# Altium PCB PCB_GTV3.5.PcbDoc (part 1 of 11)
Units mil, origin at the board's own origin, x right, y up, seen from the top; angles counter-clockwise.
Board outline 8070.87 x 4881.89 mil, 4 copper layers (Top Layer, GND, PWR, Bottom Layer), stack 61.653 mil thick; 490 components, 296 nets, 1533 pads, 845 vias.
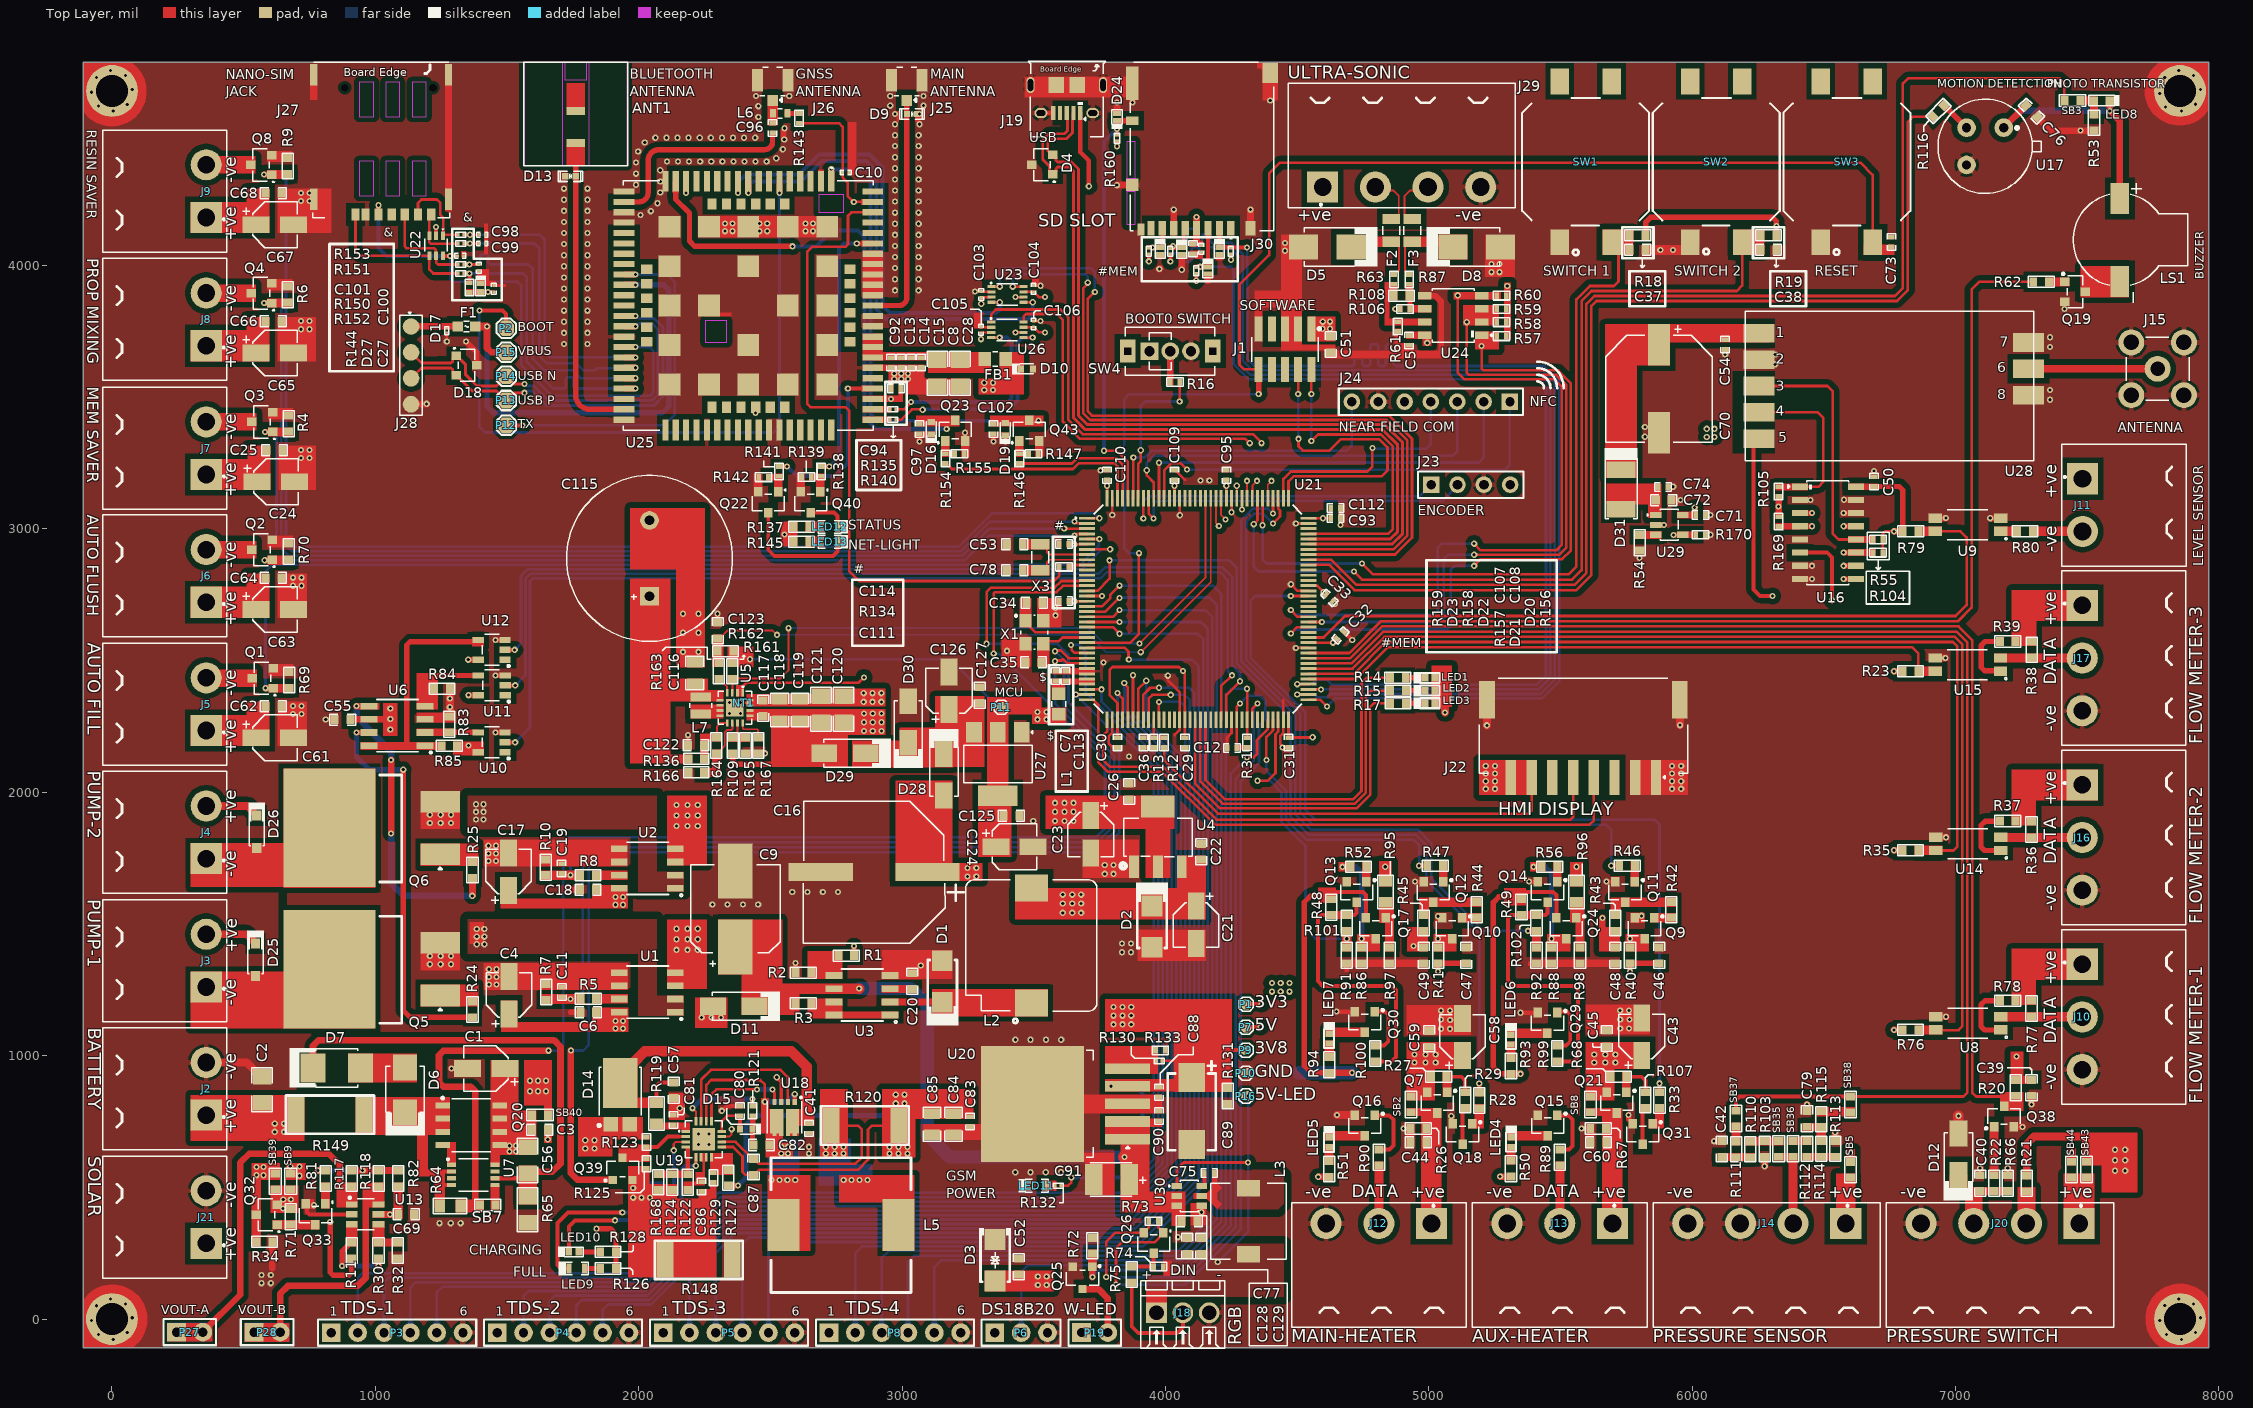
[diagram p0: Top Layer view]
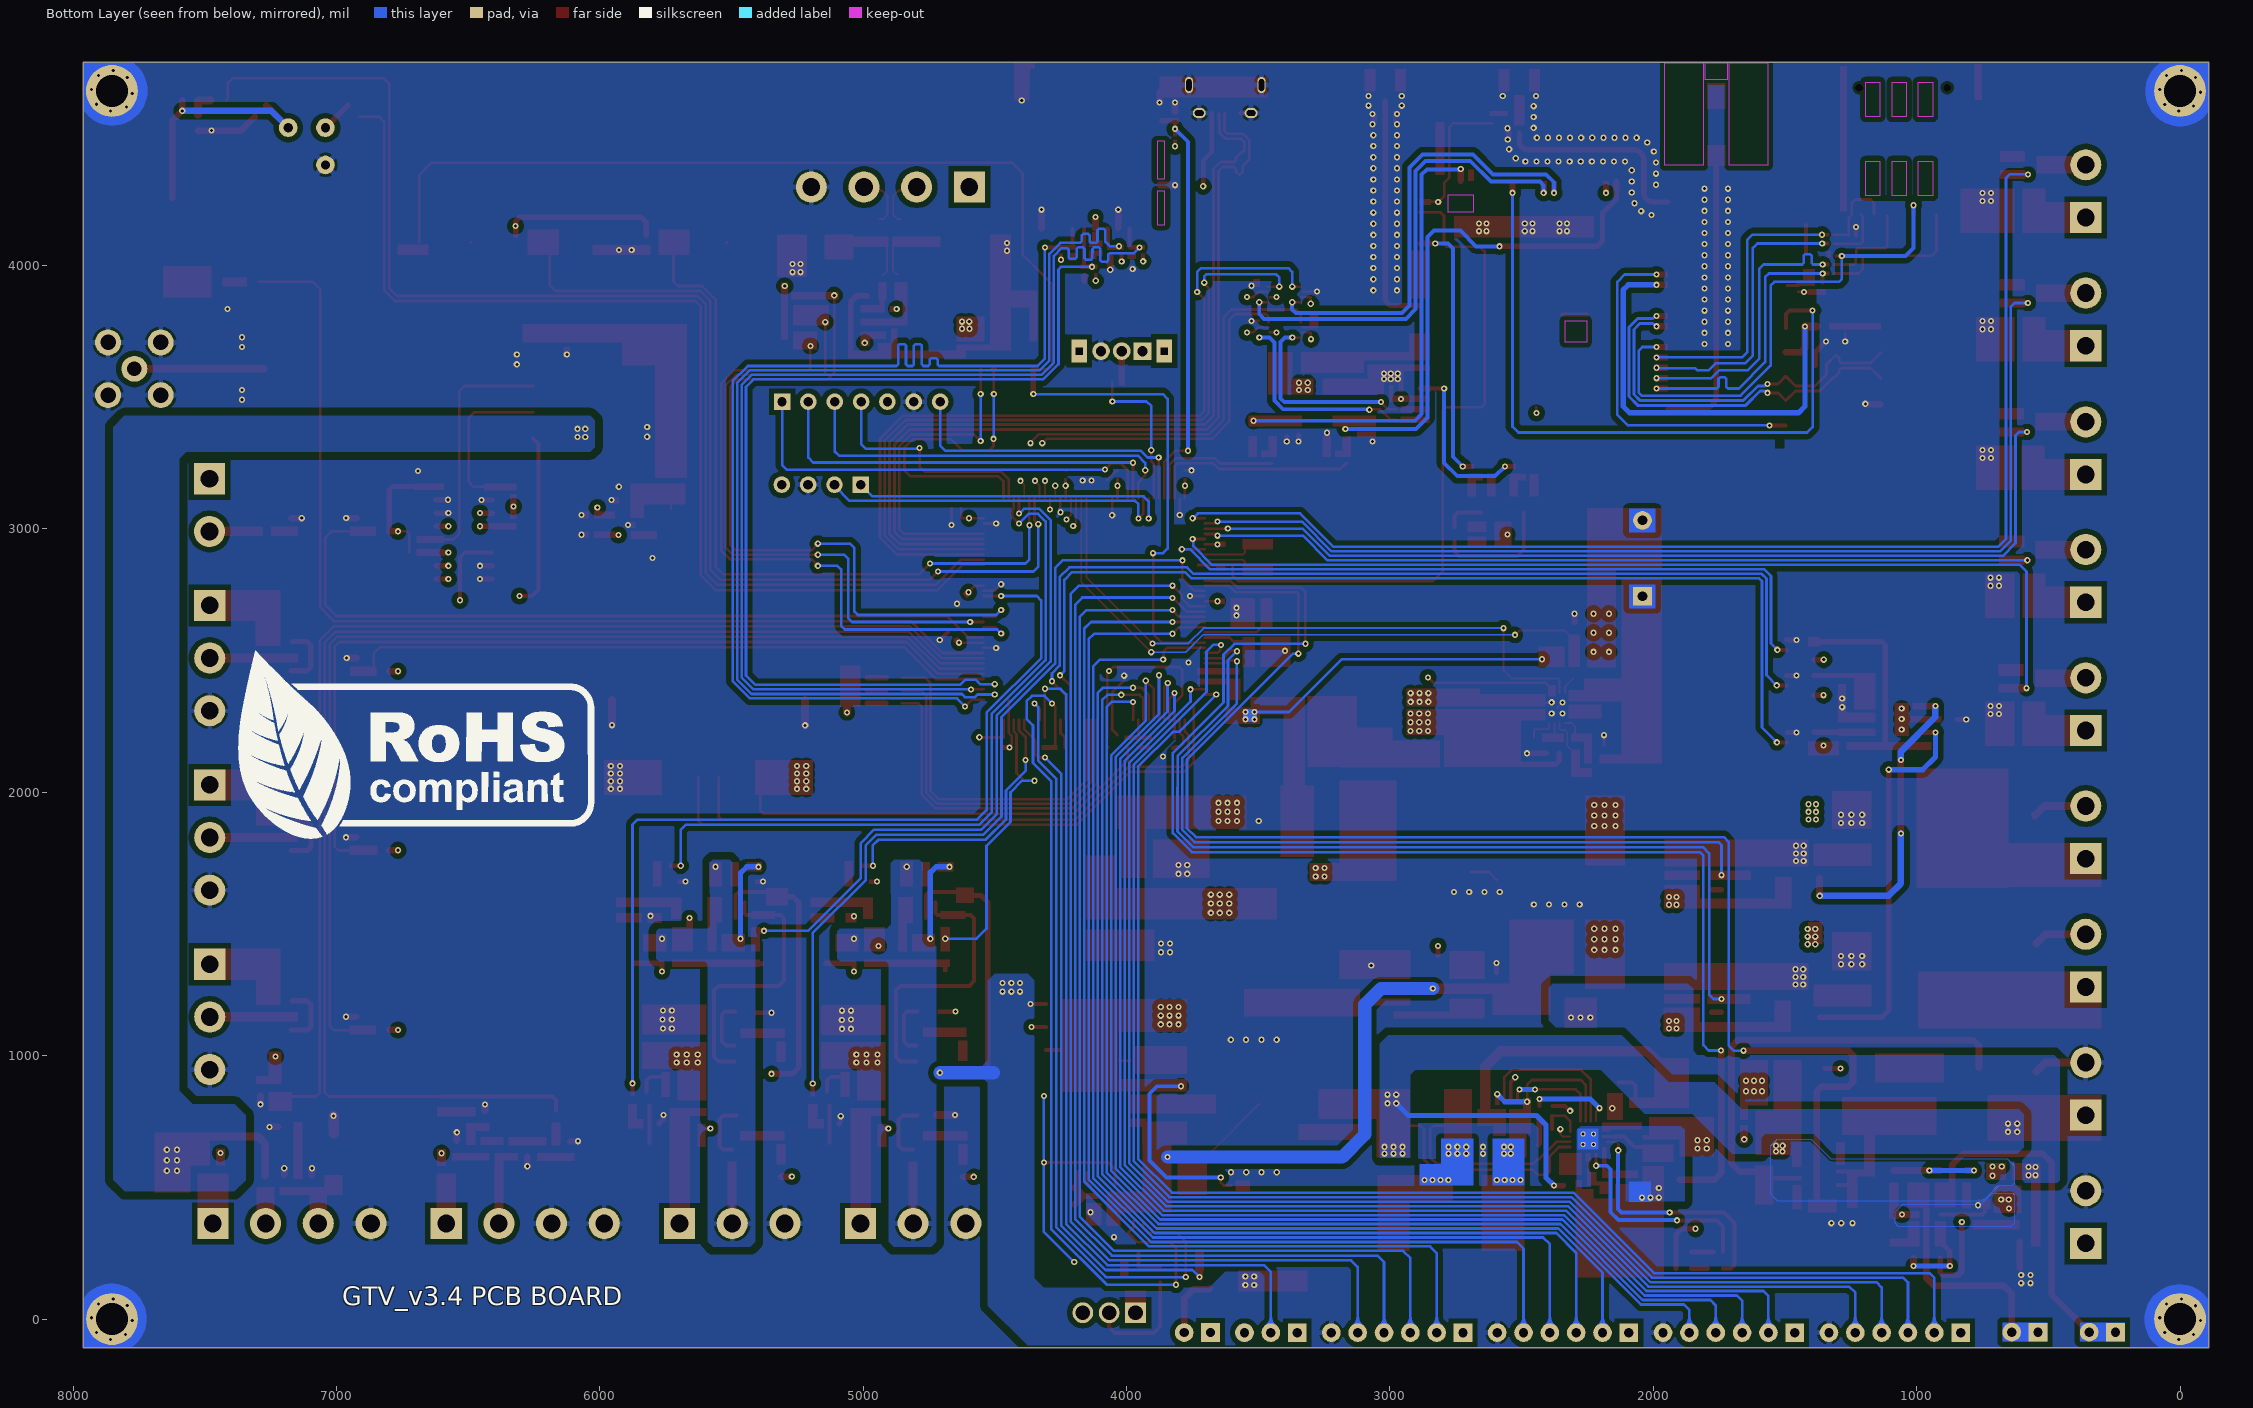
[diagram p1: Bottom Layer view, seen from below]
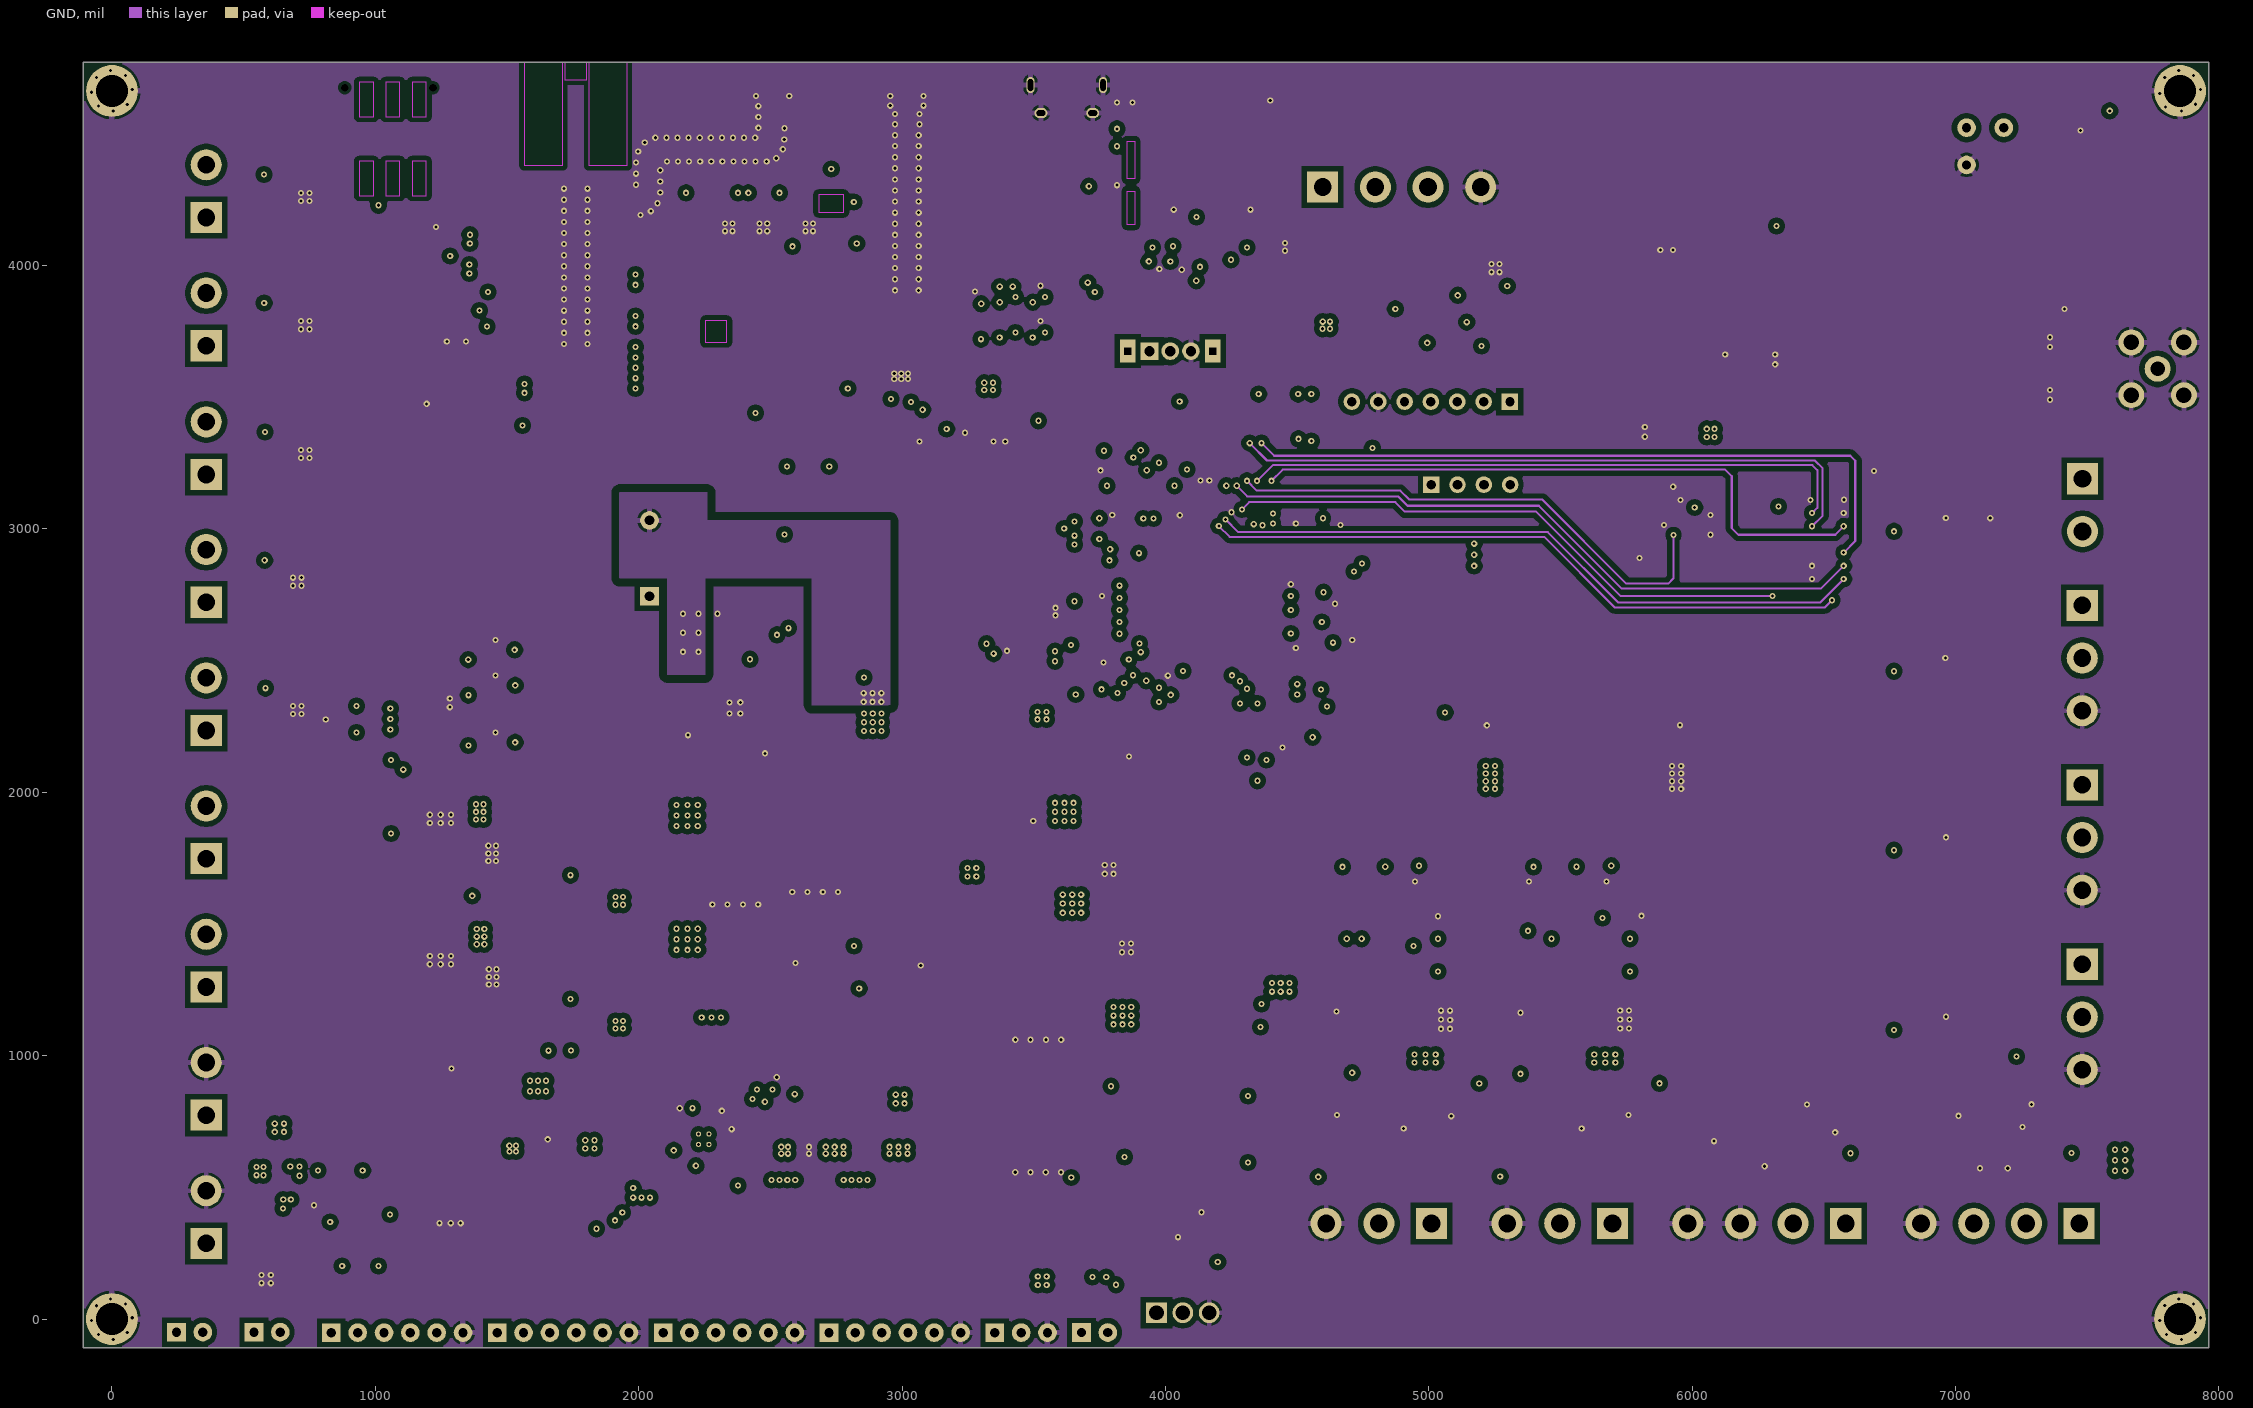
[diagram p2: GND]
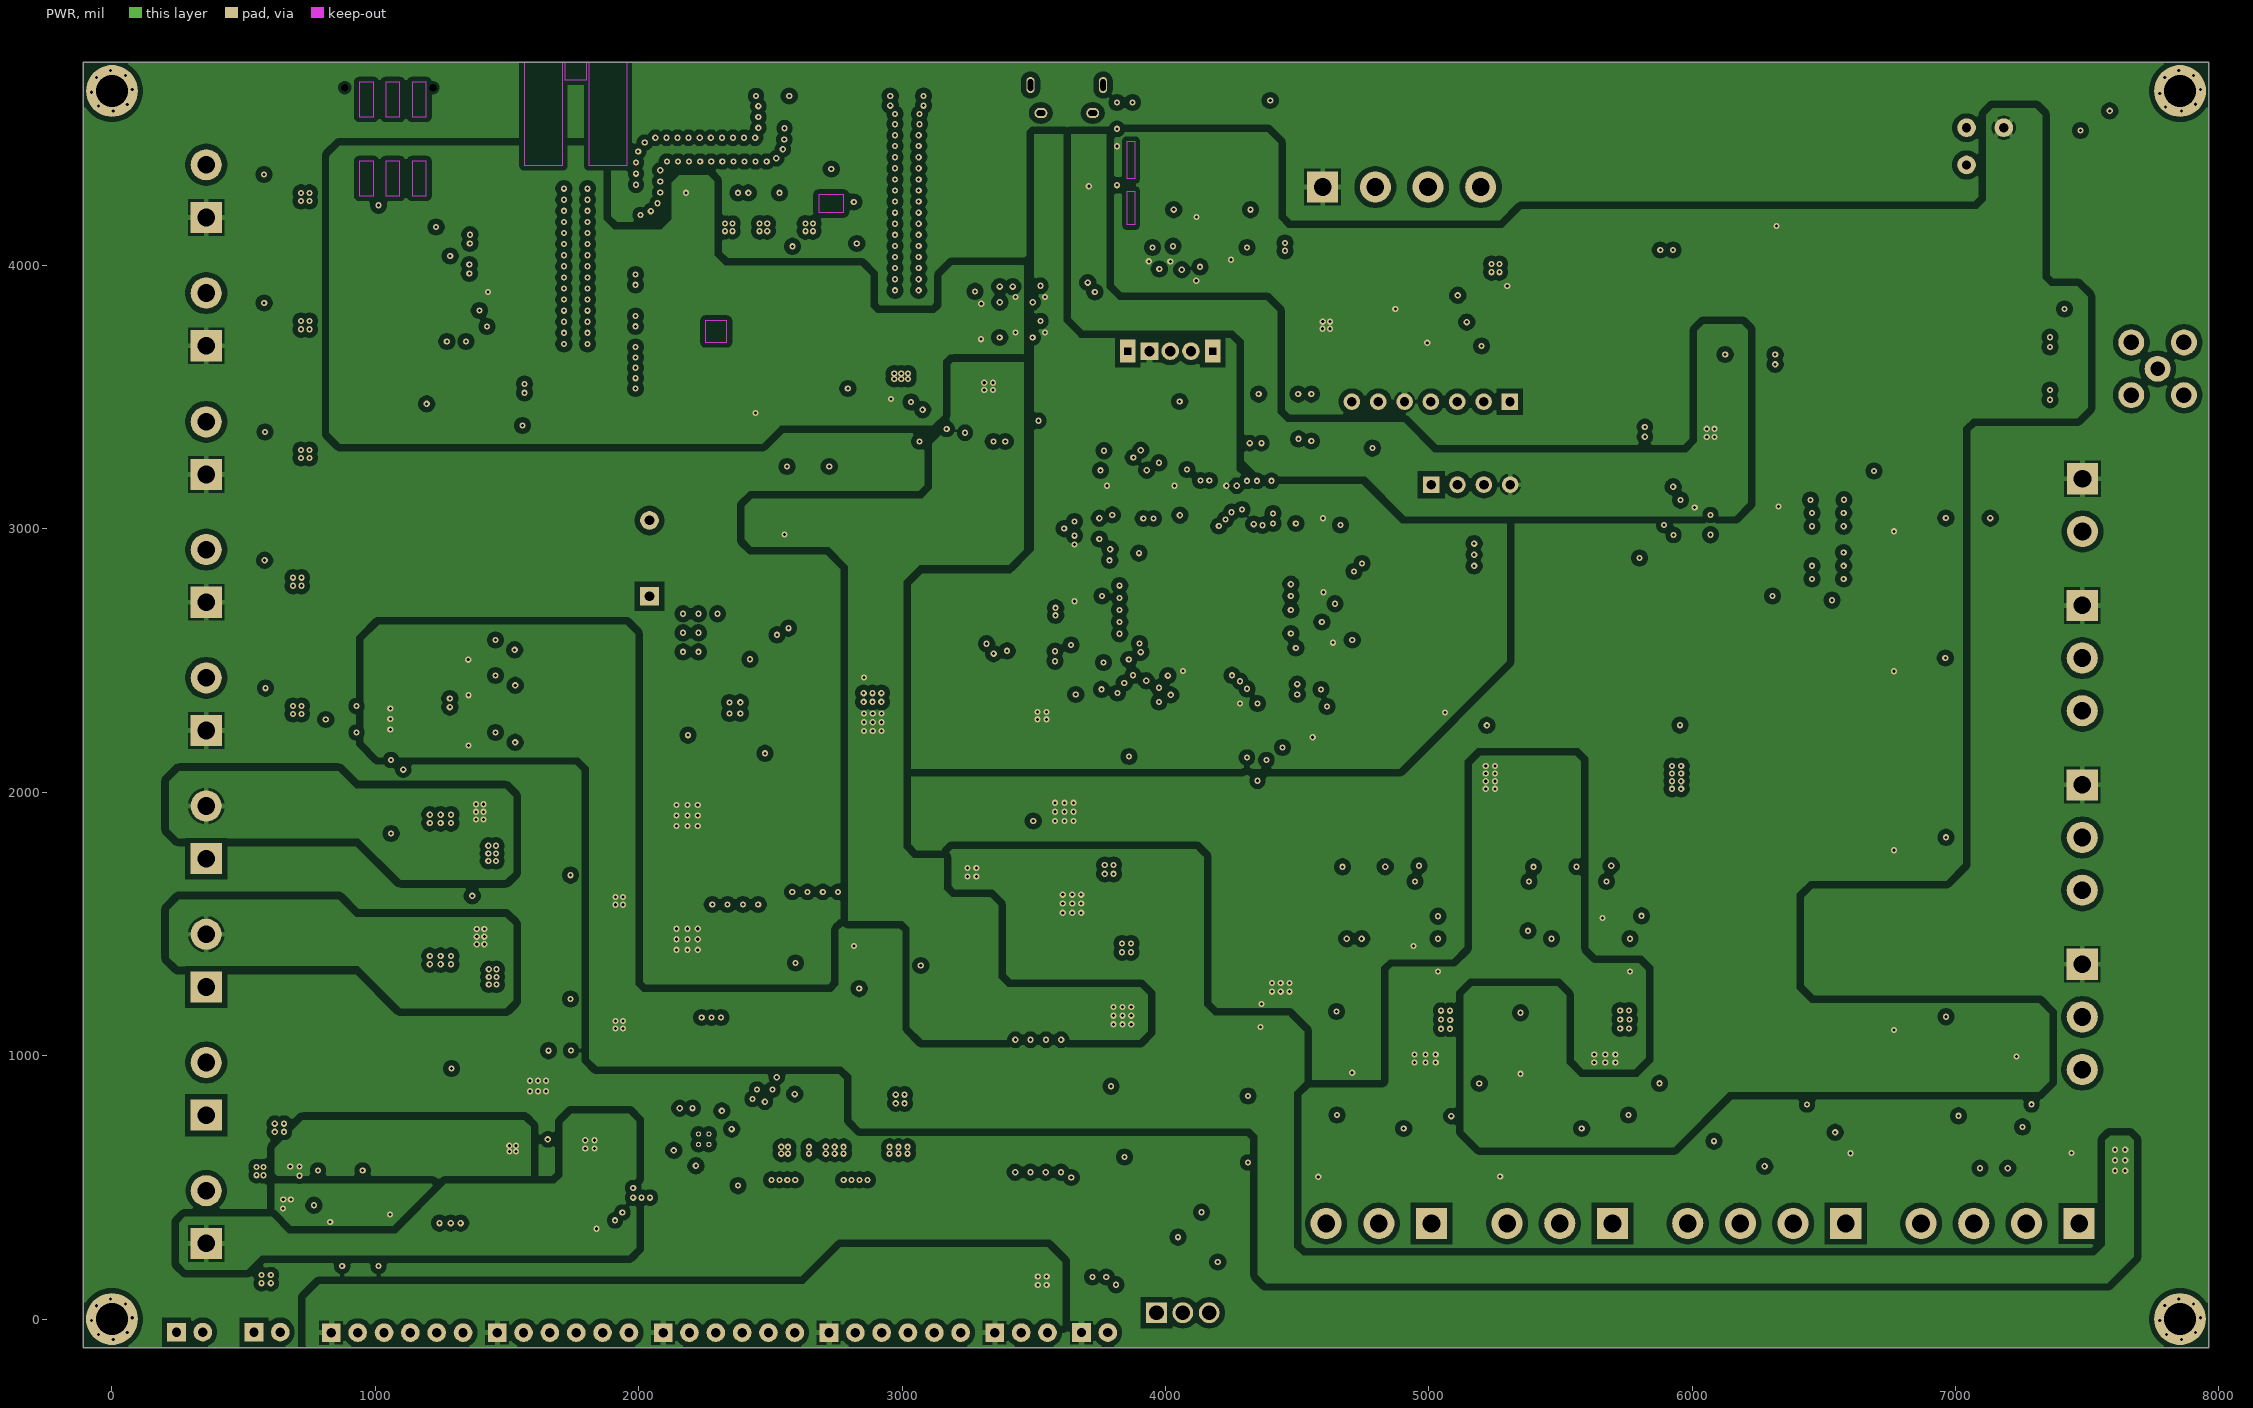
[diagram p3: PWR]
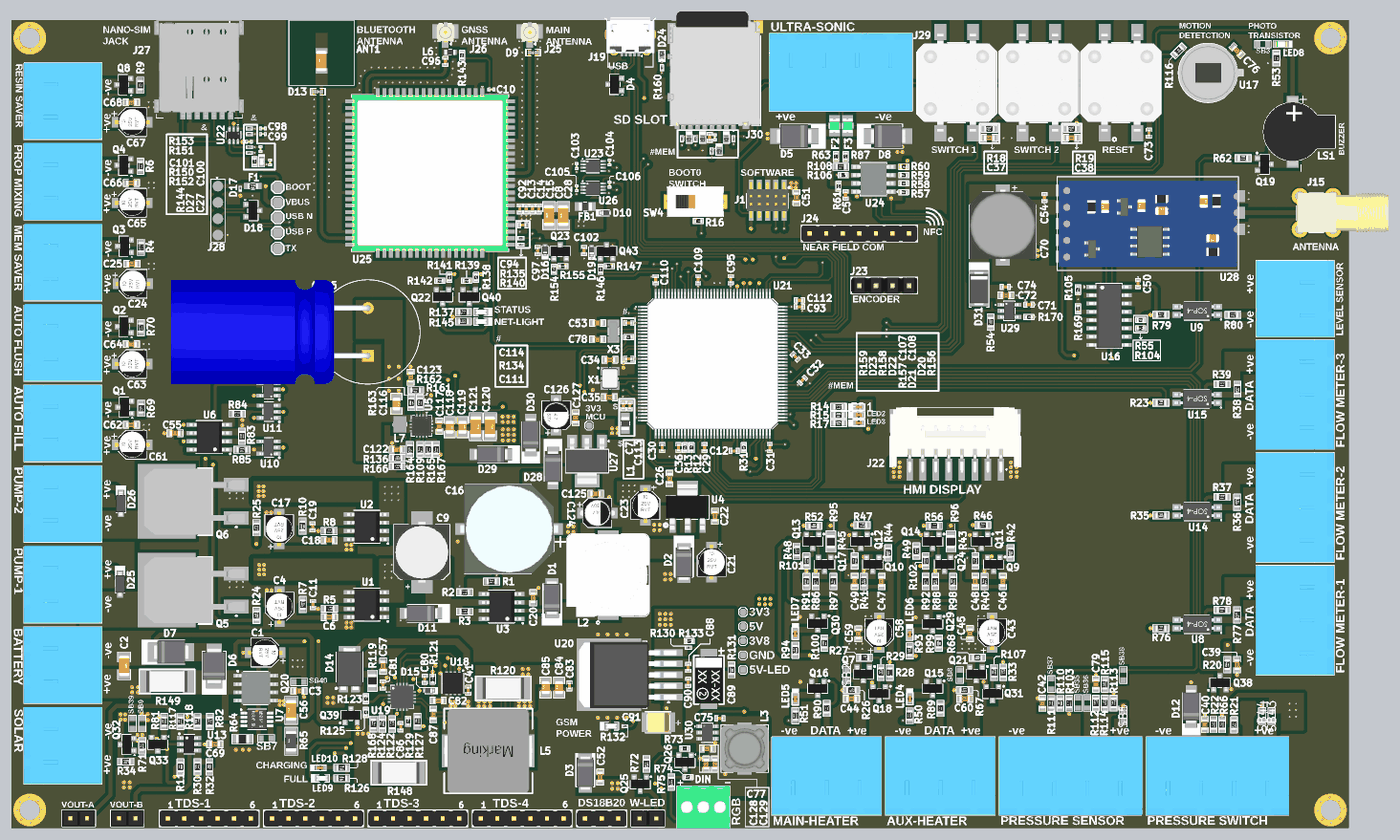
[diagram p9: 3D render of the assembled board from above, using the file's embedded part models]

## Layer stack, top to bottom
Top Solder: solder mask 0.709, Solder Resist, Dk 3.5
Top Layer: signal copper 1.378
Dielectric 2: prepreg 7.992, PP-006, Dk 4.4
GND: signal copper 1.181
Dielectric 1: core 40.551, FR-4, Dk 4.6
PWR: signal copper 1.181
Dielectric 3: prepreg 7.992, PP-006, Dk 4.4
Bottom Layer: signal copper 1.378
Bottom Solder: solder mask 0.709, Solder Resist, Dk 3.5

## Board outline
-109.33,-109.43 7961.54,-109.43 7961.54,4772.46 -109.33,4772.46

## Design rules (kind name [scope] priority, off if disabled: settings)
Clearance [All] p1: gap=10 ignorepadtopadclearanceinfootprint=FALSE except(7: Arc-SMDPad Track-Track Track-SMDPad SMDPad-SMDPad SMDPad-Via SMDPad-Fill; 20: Arc-Poly Track-Poly SMDPad-Poly THPad-Poly Via-Poly Fill-Poly Poly-Region; 30: Poly-Poly)
ComponentClearance [All] p1: gap=0 collisioncheckmode=3 verticalgap=0 showdistances=FALSE
DiffPairsRouting RS485 [InDifferentialPairClass('RS485_LINES')] p1: maxlimit=15 minlimit=15 mostfreqgap=15 toplayer_minwidth=7 toplayer_maxwidth=7 toplayer_prefwidth=7 bottomlayer_minwidth=7 bottomlayer_maxwidth=7 bottomlayer_prefwidth=7 impedanceprofiledriven=TRUE impedanceprofileid={96F7C619-5FC5-426D-8E7C-580E3D6EA915} impedanceprofilevalue=120.000000 maxuncoupledlength=500
DiffPairsRouting USB [All] p2: maxlimit=8 minlimit=8 mostfreqgap=8 toplayer_minwidth=11 toplayer_maxwidth=11 toplayer_prefwidth=11 bottomlayer_minwidth=11 bottomlayer_maxwidth=11 bottomlayer_prefwidth=11 impedanceprofiledriven=TRUE impedanceprofileid={F2DA4722-311A-4C31-A35F-DFB7A417A014} impedanceprofilevalue=90.000000 maxuncoupledlength=500
HoleSize [All] p1: absolutevalues=TRUE maxlimit=1000 minlimit=1 maxpercent=80.000 minpercent=20.000
HoleToHoleClearance [All] p1: gap=0 allowstackedmicrovias=TRUE
MatchedLengths "Schematic Matched Net Lengths_1" [InNetClass('GSM_USB')] p1: tolerance=20 checknetsindiffpair=TRUE checkdiffpairvsdiffpair=FALSE checkxsignals=FALSE checkothers=FALSE
MatchedLengths "Schematic Matched Net Lengths" [InNetClass('RS485')] p2: tolerance=20 checknetsindiffpair=TRUE checkdiffpairvsdiffpair=FALSE checkxsignals=FALSE checkothers=FALSE
MatchedLengths "Schematic Matched Net Lengths_2" [InNetClass('USB_D')] p3: tolerance=50 checknetsindiffpair=TRUE checkdiffpairvsdiffpair=FALSE checkxsignals=FALSE checkothers=FALSE
MaxMinImpedance "Schematic Impedance Constraint_1" [InNetClass('GSM_USB')] p1: minimum=88.00 maximum=90.00
MaxMinImpedance "Schematic Impedance Constraint" [InNetClass('RS485')] p2: minimum=115.0 maximum=120.0
MaxMinImpedance "Schematic Impedance Constraint_2" [InNetClass('USB_D')] p3: minimum=85.00 maximum=90.00
MinimumSolderMaskSliver [All] p1: minsoldermaskwidth=0
PlaneClearance PlaneClearance_1 [All] p1: clearance=5
PlaneConnect [All] p1: pad.planeconnectstyle=Relief pad.reliefexpansion=20 pad.reliefentries=4 pad.reliefconductorwidth=20 pad.reliefairgap=10 via.planeconnectstyle=Direct via.reliefexpansion=20 via.reliefentries=4 via.reliefconductorwidth=10 via.reliefairgap=10
PolygonConnect [All] p1: thpad.connectstyle=Relief thpad.reliefconductorwidth=20 thpad.reliefentries=4 thpad.polygonreliefangle="90 Angle" thpad.airgapwidth=10 smdpad.connectstyle=Direct smdpad.reliefconductorwidth=20 smdpad.reliefentries=4 smdpad.polygonreliefangle="90 Angle" smdpad.airgapwidth=10 via.connectstyle=Direct via.reliefconductorwidth=10 via.reliefentries=4 via.polygonreliefangle="90 Angle" via.airgapwidth=10
RoutingVias [All] p1: holewidth=11.81 width=23.62 viastyle="Through Hole" minholewidth=11.81 minwidth=23.62 maxholewidth=31.5 maxwidth=62.99
SilkToSilkClearance [All] p1: silktosilkclearance=0
SilkToSolderMaskClearance [IsPad] p1: minsilkscreentomaskgap=0 clearancetoexposedcopper=TRUE
SolderMaskExpansion SolderMaskExpansion_1 [IsVia] p1: expansion=0 istentingtop=FALSE soldermaskfromhole=TRUE
SolderMaskExpansion [Not IsVia] p2: expansion=4 istentingtop=FALSE
SupplyNets "Schematic Supply Nets_24" [InNet('VCC##12')] p1: voltage=0.000
SupplyNets "Schematic Supply Nets_23" [InNet('5V-LED')] p2: voltage=0.000
SupplyNets "Schematic Supply Nets_21" [InNet('3V3_MCU')] p3: voltage=0.000
SupplyNets "Schematic Supply Nets_20" [InNet('3V3')] p4: voltage=0.000
SupplyNets "Schematic Supply Nets_19" [InNet('VIOUT_1')] p5: voltage=0.000
SupplyNets "Schematic Supply Nets_18" [InNet('BAT')] p6: voltage=0.000
SupplyNets "Schematic Supply Nets_17" [InNet('GND')] p7: voltage=0.000
SupplyNets "Schematic Supply Nets_16" [InNet('USB_VBUS')] p8: voltage=0.000
SupplyNets "Schematic Supply Nets_15" [InNet('VIOUT_2')] p9: voltage=0.000
SupplyNets "Schematic Supply Nets_14" [InNet('VCC#M')] p10: voltage=0.000
SupplyNets "Schematic Supply Nets_13" [InNet('AGND')] p11: voltage=0.000
SupplyNets "Schematic Supply Nets_12" [InNet('VCC')] p12: voltage=0.000
SupplyNets "Schematic Supply Nets_11" [InNet('VCC_M')] p13: voltage=0.000
SupplyNets "Schematic Supply Nets_10" [InNet('S_VIN')] p14: voltage=0.000
SupplyNets "Schematic Supply Nets_9" [InNet('VREF')] p15: voltage=0.000
SupplyNets "Schematic Supply Nets_8" [InNet('5V')] p16: voltage=0.000
SupplyNets "Schematic Supply Nets_7" [InNet('VDD_EXT')] p17: voltage=0.000
SupplyNets "Schematic Supply Nets_6" [InNet('2V8')] p18: voltage=0.000
SupplyNets "Schematic Supply Nets_5" [InNet('VCC5V')] p19: voltage=0.000
SupplyNets "Schematic Supply Nets_4" [InNet('PGND')] p20: voltage=0.000
SupplyNets "Schematic Supply Nets_3" [InNet('VCC#P')] p21: voltage=0.000
SupplyNets "Schematic Supply Nets_2" [InNet('SIM_VDD')] p22: voltage=0.000
SupplyNets "Schematic Supply Nets_1" [InNet('GSM_PWR')] p23: voltage=0.000
SupplyNets "Schematic Supply Nets" [InNet('VCC#12')] p24: voltage=0.000
UnRoutedNet [All] p1: checkbadconnections=TRUE
Width [All] p1: maxlimit=70 minlimit=7 preferedwidth=22 toplayer_prefwidth=10 midlayer1_minwidth=8 midlayer1_maxwidth=40 midlayer2_minwidth=8 midlayer2_maxwidth=40 bottomlayer_prefwidth=10 minimp=50.000000 maximp=50.000000 favimp=50.000000
20 further rules are at their usual default settings.

## Classes and differential pairs
component class U_SD-Card-Sheet: C107 C108 D20 D21 D22 D23 D24 J30 R156 R157 R158 R159 R160
differential pair class RS485_LINES: RS485
net class RS485: RS485_N RS485_P
component class U_Ultra_Sonic_Section: C5 D5 D8 F2 F3 J29 R57 R58 R59 R60 R61 R63 R87 R106 R108 U24
component class U_HMI_Encoder_NFC_Sheet: J22 J23 J24
differential pair class GSM_USB_Lines: GSM_USB_D
net class GSM_USB: GSM_USB_D_N GSM_USB_D_P
component class U_Solar_Charge_Controller: C41 C57 C80 C81 C82 C83 C84 C85 C86 C87 D14 D15 J21 L5 LED9 LED10 Q39 R119 R120 R121 R122 R123 R124 R125 R126 R127 R128 R129 R148 R168 U18 U19
component class U_GSM_Sheet: ANT1 C8 C10 C13 C14 C15 C27 C28 C92 C94 C96 C97 C98 C99 C100 C101 C102 C103 C104 C105 C106 D9 D10 D13 D16 D17 D18 D19 D27 F1 FB1 J25 J26 J27 J28 L6 LED12 LED13 P2 P12 P13 P14 P15 Q22 Q23 Q40 Q43 R134 R135 R137 R138 R139 R140 R141 R142 R143 R144 R145 R146 R147 R150 R151 R152 R153 R154 R155 U22 U23 U25 U26
differential pair class USB_D_Lines: USB_D
net class USB_D: USB_D_N USB_D_P
component class U_Voltage_Monitoring_Section: C69 P27 P28 Q32 Q33 R11 R30 R32 R34 R71 R81 R82 R117 R118 S SB9 SB39 U13
component class U_Temperature_Sense_Section: C52 D3 P3 P4 P5 P6 P8
component class U_Valve_Section: C24 C25 C61 C62 C63 C64 C65 C66 C67 C68 J5 J6 J7 J8 J9 Q1 Q2 Q3 Q4 Q8 R4 R6 R9 R69 R70 S
component class U_Sensor_Section: J10 J11 J16 J17 R23 R35 R36 R37 R38 R39 R76 R77 R78 R79 R80 U8 U9 U14 U15
component class U_LED_Section: J18 P19 Q25 Q26 R72 R73 R74 R75 S
component class U_Heater_Section: C43 C44 C45 C46 C47 C48 C49 C58 C59 C60 J12 J13 LED4 LED5 LED6 LED7 Q7 Q9 Q10 Q11 Q12 Q13 Q14 Q15 Q16 Q17 Q18 Q21 Q24 Q29 Q30 Q31 R26 R27 R28 R29 R33 R40 R41 R42 R43 R44 R45 R46 R47 R48 R49 R50 R51 R52 R56 R67 R68 R86 R88 R89 R90 R91 R92 R93 R94 R95 R96 R97 R98 R99 R100 R101 R102 R107 S SB2 SB8
component class U_Switch_Sheet: C37 C38 R18 R19 SW1 SW2
component class U_Regulator_Section: C9 C16 C20 C21 C22 C23 C26 C75 C77 C88 C89 C90 C91 C115 C116 C117 C118 C119 C120 C121 C122 C123 C124 C125 C126 C127 C128 C129 D1 D2 D11 D28 D29 D30 L2 L3 L7 LED11 NT1 P1 P7 P9 P10 P11 P16 R1 R2 R3 R109 R130 R131 R132 R133 R136 R161 R162 R163 R164 R165 R166 R167 U3 U4 U5 U20 U27 U30
component class U_Receiver_Section: C50 C54 C70 C71 C72 C74 D31 J15 R54 R55 R104 R105 R169 R170 S U16 U28 U29
component class U_Gate_Driver_Section: C55 D25 D26 J3 J4 Q5 Q6 R24 R25 R83 R84 R85 U6 U10 U11 U12
component class U_Current_Sense_Section: C4 C6 C11 C17 C18 C19 R5 R7 R8 R10 U1 U2
component class U_Controller_Section: C7 C12 C29 C30 C31 C32 C33 C34 C35 C36 C53 C73 C78 C93 C95 C109 C110 C111 C112 C113 C114 L1 LED1 LED2 LED3 R12 R13 R14 R15 R16 R17 R31 S SW3 SW4 U21 X1 X3
component class U_Connector_Section: C39 C40 C42 C51 C76 C79 D4 D12 J1 J14 J19 J20 LED8 LS1 Q19 Q38 R20 R21 R22 R53 R62 R66 R103 R110 R111 R112 R113 R114 R115 R116 S SB3 SB5 SB35 SB36 SB37 SB38 SB43 SB44 U17
component class "U_Reverse Protection_Section": C1 C2 C3 C56 D6 D7 J2 Q20 R64 R65 R149 SB7 SB40 U7
differential pair RS485: +RS485_P -RS485_N
differential pair GSM_USB_D: +GSM_USB_D_P -GSM_USB_D_N
differential pair USB_D: +USB_D_P -USB_D_N

## Components (designator, comment, footprint, x,y, rotation, side; value= is the part's Value field where it differs from the comment)
ANT1 "ANT3216LL00R2400A" ANT3216LL00R2400A 1760.87,4464.99 r90 top locked
C1 "10uF" RVT1E100M0405. 1421.11,951.4 r180 top locked
C2 "0.1uF" Cap-1206 569.87,871.03 r270 top locked
C3 "1uF" Cap0603 1624.87,719.03 r0 top locked
C4 "10uF" RVT1E100M0405. 1507.5,1229.51 r90 top locked
C5 "0.1uf" Cap-0402 4925.03,3715.56 r90 top locked
C6 "0.1uF" Cap0603 1808.5,1165.29 r180 top locked
C7 "1uF" Cap-0402 3583,2442 r90 top locked
C8 "100uF" Cap-1206 3134.32,3591.03 r90 top locked
C9 "100uF" UWX1E101MCL1GB 2366.88,1557.19 r90 top locked
C10 "0.1uF" CAP-0201 2786.08,4353.28 r0 top locked
C11 "1nF" Cap-0402 1709.28,1241.51 r90 top locked
C12 "0.1uF" Cap-0402 4252.01,2169.01 r180 top
C13 "10pF" Cap-0402 2996.3,3631.51 r90 top locked
C14 "33pF" Cap-0402 3034.32,3631.51 r90 top locked
C15 "1uF" Cap-0402 3072.32,3631.51 r90 top locked
C16 "470uF" VT1H471MI135000CE0 2893.98,1697.4 r180 top locked
C17 "10uF" RVT1E100M0405. 1505.55,1698.51 r90 top locked
C18 "0.1uF" Cap0603 1807.5,1630.29 r180 top locked
C19 "1nF" Cap-0402 1707.28,1710.51 r90 top locked
C20 "470pF" Cap0603 3038.87,1283.03 r270 top locked
C21 "10uF" RVT1E100M0405. 4116.22,1497.2 r270 top locked
C22 "0.1uF" Cap0603 4135.98,1774.4 r90 top locked
C23 "10uF" RVT1E100M0405. 3716.12,1840.43 r270 top locked
C24 "10uF" RVT1E100M0405. 622,3179.07 r0 top locked
C25 "0.1uF" Cap0603 617,3299.03 r0 top locked
C26 "0.1uF" Cap0603 3862,2003 r90 top locked
C27 "0.1uF" CAP-0201 1450,3912 r90 top locked
C28 "100uF" Cap-1206 3220.32,3591.03 r90 top locked
C29 "0.1uF" Cap-0402 4073.66,2189 r270 top locked
C30 "0.1uF" Cap-0402 3817.75,2189 r270 top locked
C31 "0.1uF" Cap-0402 4467.36,2189 r270 top locked
C32 "0.1uF" Cap-0402 4664.55,2596.28 r45 top locked
C33 "0.1uF" Cap-0402 4621.95,2737.9 r315 top locked
C34 "30pF" Cap0603 3502.16,2719.66 r180 top locked
C35 "30pF" Cap0603 3499.16,2493.31 r0 top locked
C36 "0.1uF" Cap-0402 3916.17,2189 r270 top locked
C37 "0.1uF" Cap0603 5792.92,4060.4 r180 top locked
C38 "0.1uF" Cap0603 6289.27,4060.4 r180 top locked
C39 "0.1uF" Cap0603 7288.23,878.03 r270 top locked
C40 "1uF" Cap0603 7092.99,516.03 r90 top locked
C41 "1uF" Cap0402 2646.47,724.25 r90 top locked
C42 "1uF" Cap-0603 6112.87,645.4 r90 top locked
C43 "10uF" RVT1E100M0405. 5808.37,1072.03 r90 top locked
C44 "0.1uF" Cap0603 4960.17,671.62 r0 top locked
C45 "1uF" Cap0603 5675.87,1065.03 r90 top locked
C46 "0.1uF" Cap0603 5874.27,1381.03 r90 top locked
C47 "0.1uF" Cap0603 5142.11,1381.03 r90 top locked
C48 "0.1uF" Cap0603 5707.87,1381.03 r270 top locked
C49 "0.1uF" Cap0603 4979.87,1381.03 r270 top locked
C50 "100nF" Cap-0402 6690,3180 r90 top
C51 "0.1uF" Cap0603 4627.92,3699.92 r270 top locked
C52 "0.1uF" Cap0603 3442.87,199.03 r90 top locked
C53 "20pF" Cap0603 3428,2942.1 r0 top locked
C54 "100nF" Cap-0402 6125,3700 r270 top
C55 "0.1uF" Cap0603 875.87,2276.03 r180 top locked
C56 "0.047uF" Cap-1206 1577.98,602.4 r90 top locked
C57 "10uF" Cap0603 2132.75,868.67 r90 top locked
C58 "10uF" RVT1E100M0405. 5127.87,1071.03 r90 top locked
C59 "1uF" Cap0603 5001.64,1064.03 r90 top locked
C60 "0.1uF" Cap0603 5643.87,671.62 r0 top locked
C61 "10uF" RVT1E100M0405. 618,2207.07 r0 top locked
C62 "0.1uF" Cap0603 613,2327 r0 top locked
C63 "10uF" RVT1E100M0405. 618,2694.03 r0 top locked
C64 "0.1uF" Cap0603 613,2814.03 r0 top locked
C65 "10uF" RVT1E100M0405. 618,3668 r0 top locked
C66 "0.1uF" Cap0603 613,3788 r0 top locked
C67 "10uF" RVT1E100M0405. 618,4155.18 r0 top locked
C68 "0.1uF" Cap0603 613,4275 r0 top locked
C69 "0.1uF" Cap0603 1117.14,397.46 r0 top locked
C70 "1000uF" UUD1A102MNL1GS 5873.75,3532.69 r270 top value=1mF
C71 "1uF" Cap-0402 6031.6,3052.85 r180 top
C72 "10uF" Cap-0603 5891.75,3109.38 r180 top
C73 "0.1uF" Cap-0402 6755.87,4089.03 r270 top locked
C74 "100nF" Cap-0402 5888.75,3160 r180 top
C75 "0.1uF" Cap-0402 4166.25,554 r180 top locked
C76 "0.1uF" Cap0603 7288.18,4586.37 r315 top locked
C77 "10uF" Cap-0603 4090.51,371.33 r180 top locked
C78 "20pF" Cap0603 3428,2843.1 r0 top locked
C79 "1uF" Cap-0603 6435.87,760.03 r270 top locked
C80 "1uF" Cap0402 2383.87,790.03 r90 top locked
C81 "1uF" Cap0402 2131.75,755.67 r270 top locked
C82 "0.1uF" Cap0603 2466,661 r0 top
C83 "1uF" Cap0402 3257.75,749.67 r90 top locked
C84 "22uF" Cap-0805 3195.25,739.67 r90 top locked
C85 "22uF" Cap-0805 3113.75,739.67 r90 top locked
C86 "1uF" Cap0402 2238.63,503.17 r90 top locked
C87 "0.1uF" Cap0603 2435.8,577.51 r270 top
C88 "0.1uf" Cap-0402 3974.73,861.41 r90 top locked
C89 "330uF" Case-E 4099.73,917.16 r270 top locked
C90 "0.1uf" Cap-0402 3974.73,771.16 r270 top locked
C91 "100uF" Case-B 3794.91,529.8 r180 top locked
C92 "0.1uF" Cap-0402 2958.32,3631.51 r90 top locked
C93 "0.1uF" Cap-0402 4646,3040.52 r0 top locked
C94 "2.2uF" Cap-0402 2976.87,3533.07 r180 top locked
C95 "0.1uF" Cap-0402 4231.14,3204 r90 top locked
C96 "33pF" Cap-0402 2508.52,4522.79 r90 top locked
C97 "0.1uf" Cap-0402 3065.6,3379.76 r90 top locked
C98 "22PF" CAP-0201 1406.77,4117.12 r180 top locked value=22pF
C99 "22pF" CAP-0201 1406.77,4083.5 r180 top locked
C100 "22pF" CAP-0201 1392.87,3992.22 r90 top locked
C101 "0.1uf" CAP-0201 1322.86,4036.85 r0 top locked
C102 "0.1uf" Cap-0402 3346.6,3379.76 r90 top locked
C103 "0.1uf" CAP-0201 3300.41,3890.18 r90 top locked
C104 "0.1uf" CAP-0201 3499,3912 r90 top locked
C105 "" CAP-0201 3300,3756 r90 top locked
C106 "" CAP-0201 3499,3778 r90 top locked
C107 "10uF" Cap-0402 4104.37,4063.5 r90 top locked
C108 "0.1uF" CAP-0201 4136,4063.77 r90 top locked
C109 "0.1uF" Cap-0402 4034.28,3204 r90 top locked
C110 "0.1uF" Cap-0402 3778.38,3204 r90 top locked
C111 "0.1uF" Cap-0402 3615.36,2725.56 r180 top locked
C112 "10uF" Cap-0402 4646,3079 r0 top locked
C113 "0.1uF" Cap-0402 3621,2442 r90 top locked
C114 "0.1uF" Cap-0402 3615.36,2942.1 r180 top locked
C115 "25F" SCCU25B256SRB 2041,2888.09 r90 top locked
C116 "22uF" Cap-0805 2213.33,2453 r270 top locked
C117 "1uF" Cap-0603 2472.33,2319 r270 top locked
C118 "22uF" Cap-0805 2535.51,2312.53 r270 top locked
C119 "22uF" Cap-0805 2612.51,2312.53 r270 top locked
C120 "47uF" Cap-1206 2778.33,2315 r270 top locked
C121 "47uF" Cap-1206 2692.33,2315 r270 top locked
C122 "0.47uF" Cap-0603 2217.33,2178 r0 top locked
C123 "2.2nF" Cap-0603 2299.33,2614 r270 top locked
C124 "10uF" RVT1E100M0405_ 3427,1794 r0 top locked
C125 "0.1uF" Cap-0603 3415,1911 r180 top locked
C126 "10uF" RVT1E100M0405_ 3178.15,2385.5 r90 top locked
C127 "0.1uF" Cap-0603 3295,2369 r270 top
C128 "22uF" Cap-0603 4082.51,277.22 r270 top locked
C129 "22uF" Cap-0603 4135.51,277.22 r270 top locked
D1 "SS24A" SMA#1 3152.87,1282.03 r90 top locked
D2 "1SMA5930BT3G" SMA#1 3948.87,1490.03 r270 top locked
D3 "SMAJ5.0CA" SMAJ5.0CA 3352.98,223.4 r270 top locked
D4 "ESD5302F-3/TR" Sot-23 3531.88,4383.23 r90 top locked
D5 "SMBJ26CA" SMB_ 4614.87,4070.55 r0 top locked
D6 "SMBJ70A/TR13" SMB 1112.87,870.03 r90 top locked
D7 "SS510B" SS510B 853.87,954.03 r0 top locked
D8 "SMBJ26CA" SMB_ 5181.92,4070.55 r180 top locked
D9 "TPESD0402G03V" TPESD0402G03V 3038,4575 r180 top locked
D10 "LESD5D5.0CT1G" SOD-523 3473.92,3607.42 r180 top locked
D11 "SS56" SMA#2 2360.98,1187.4 r180 top locked
D12 "SMAJ5.0CA" SMA#2 7010.87,626.03 r90 top locked
D13 "TPESD0402G03V" TPESD0402G03V 1741,4339 r0 top locked
D14 "PDS1040-13" "PowerDI™ 5" 1929.97,818.06 r0 top locked
D15 "ZLLS350TA" SOD-523 2408.75,721.36 r0 top locked value=3.5pF
D16 "LESD5D5.0CT1G" SOD-523 3110.6,3382.26 r270 top locked
D17 "PESD5V0H1BSFYL" DSN0603-2 1271.6,3752.89 r90 top locked
D18 "ESD5302F-3/TR" Sot-23 1346,3621 r270 top locked
D19 "LESD5D5.0CT1G" SOD-523 3391.54,3378.26 r270 top locked
D20 "LESD8D3.3CAT5G" SOD-882 4205,4055 r90 top locked
D21 "LESD8D3.3CAT5G" SOD-882 4160.84,3981.3 r90 top locked
D22 "LESD8D3.3CAT5G" SOD-882 4061.84,4054.78 r90 top locked
D23 "LESD8D3.3CAT5G" SOD-882 3980,4055 r90 top locked
D24 "LESD8D3.3CAT5G" SOD-882 3816,4564 r270 top locked
D25 "1N4148W-7-F" SOD-123 544.98,1364.4 r90 top locked value=2pF
D26 "1N4148W-7-F" SOD-123 549.98,1850.4 r90 top locked value=2pF
D27 "ESD5651N-2/TR" DFN1006-2L_ 1399.75,3916.53 r270 top locked
D28 "SS24A" SMA#2 3158.86,2066.17 r270 top locked
D29 "SS24A" SMA#2 2783.26,2147.98 r180 top locked
D30 "1SMA5930BT3G" SMA#2 3024,2267 r90 top locked
D31 "1N4007- SMD" SMA(DO-214AC) 5730,3150 r270 top
F1 "SMD0603-050" Fuse-0603 1346.6,3768.61 r180 top locked
F2 "SMD0805P020TF" Fuse-0805 4857.92,4133.54 r90 top locked
F3 "SMD0805P020TF" Fuse-0805 4937.54,4133.54 r90 top locked
FB1 "100MHz" Ind-0805 3353.87,3645.03 r0 top locked
J1 "20021121-00010C4LF" 20021121-00010C4LF_ 4453.87,3682.81 r180 top locked
J2 "TBP01R1-508-02BE" TBP01R1-508-02BE 357.92,874.12 r90 top locked
J3 "TBP01R1-508-02BE" TBP01R1-508-02BE 357.92,1361.02 r90 top locked
J4 "TBP01R1-508-02BE" TBP01R1-508-02BE 357.92,1848.07 r90 top locked
J5 "TBP01R1-508-02BE" TBP01R1-508-02BE 357.92,2334.57 r90 top locked
J6 "TBP01R1-508-02BE" TBP01R1-508-02BE 357.92,2821.57 r90 top locked
J7 "TBP01R1-508-02BE" TBP01R1-508-02BE 357.92,3306.57 r90 top locked
J8 "TBP01R1-508-02BE" TBP01R1-508-02BE 357.92,3795.57 r90 top locked
J9 "TBP01R1-508-02BE" TBP01R1-508-02BE 357.92,4282.57 r90 top locked
J10 "TBP01R1-508-03BE" TBP01R1-508-03BE 7480.98,1247.06 r270 top locked
J11 "TBP01R1-508-02BE" TBP01R1-508-02BE 7481.98,3090.4 r270 top locked
J12 "TBP01R1-508-03BE" TBP01R1-508-03BE 4910.15,363.03 r180 top locked
J13 "TBP01R1-508-03BE" TBP01R1-508-03BE 5597.15,363.03 r180 top locked
J14 "TBP01R1-508-04BE" TBP01R1-508-04BE 6382.98,363.03 r180 top locked
J15 "HJ-SMA508" HJ-SMA508_ 7767,3608.05 r270 top
J16 "TBP01R1-508-03BE" TBP01R1-508-03BE 7480.98,1928.4 r270 top locked
J17 "TBP01R1-508-03BE" TBP01R1-508-03BE 7480.98,2609.73 r270 top locked
J18 "DB125-2.54-3P-GN-S" DB125-2.54-3P-GN-S 4066,24 r0 top locked
J19 "10118194-0001LF" 10118194-0001LF_ 3625.39,4579.07 r180 top locked
J20 "TBP01R1-508-04BE" TBP01R1-508-04BE 7268.81,363.03 r180 top locked
J21 "TBP01R1-508-02BE" TBP01R1-508-02BE 357.92,387.22 r90 top locked
J22 "A2008WR-S-8P" A2008WR-S-8P 5567.33,2203.67 r180 top locked
J23 "B-2100S04P-A110" HDR1X4_ 5008.87,3168.03 r0 top locked
J24 "PZ254V-11-07P" HDR1X7 5307.87,3483.03 r180 top locked
J25 "U.FL-R-SMT-1(80)" U.FL-R-SMT-1(80)_ 3017.98,4665.4 r0 top locked
J26 "U.FL-R-SMT-1(80)" U.FL-R-SMT-1(80)_ 2508.52,4665.4 r0 top locked
J27 "XKNANO-113" XKNANO-113 1021.77,4459.25 r180 top locked
J28 "POGO Connector 4 Pin" "Pogo 4 Pin" 1135.6,3620.98 r270 top locked
J29 "TBP01R1-508-04BE" TBP01R1-508-04BE 4796.87,4298.03 r0 top locked
J30 "DM3BT-DSF-PEJS" DM3BT-DSF-PEJS 4135.87,4434.03 r180 top locked
L1 "10uH" Ind-0805 3595,2335 r90 top locked
L2 "220uH" SLF12575T-221M1R3-PF 3490.98,1418.4 r90 top locked
L3 "4.7uH" YPRH0704-4R7M 4315.75,371.33 r270 top locked
L5 "3.3uH" SRP1245CC-3R3M 2768,357 r0 top locked
L6 "68nH" "IND-0603 (1608 Metric)" 2537.52,4578.04 r180 top locked
L7 "470nH" "Inductor 1008" 2235.33,2329.52 r270 top locked
LED1 "XZMDK68W-2" "LED 0402" 5004.36,2434.16 r180 top locked
LED2 "XZMDK68W-2" "LED 0402" 5004.36,2386.1 r180 top locked
LED3 "XZMDK68W-2" "LED 0402" 5004.36,2338.03 r180 top locked
LED4 "XZMDK68W-2" "LED 0402" 5312.43,671.92 r90 top locked
LED5 "XZMDK68W-2" "LED 0402" 4621.23,670.92 r90 top locked
LED6 "XZMDK68W-2" "LED 0402" 5311.87,1061.07 r90 top locked
LED7 "XZMDK68W-2" "LED 0402" 4621.23,1065.07 r90 top locked
LED8 "ALS-PT19-315C/L177/TR8" ALS-PT19-315C/L177/TR 7554.98,4626.4 r180 top locked
LED9 "RED" LED-0603 1764.87,192.03 r180 top locked
LED10 "Green" LED-0402 1753.87,255.03 r180 top locked
LED11 "RED" LED-0603 3510.7,506.31 r180 top locked
LED12 "Yellow" LED-0603 2725,3008 r0 top
LED13 "RED" LED-0603 2725,2951.5 r0 top
LS1 "YS-SBZ9032C03R16" YS-SBZ9032C03R16 7623.87,4097.51 r270 top
NT1 "Net Tie_SMD" "Net Tie Pad" 2399.43,2340.27 r180 top locked net-tie
P1 "TEST POINT 0.5mm Dia" "Test-point - 0.5mm" 4306,1196 r0 top locked
P2 "TEST POINT" Test-point 1497,3761.64 r0 top locked
P3 "61300611121" HDR1X6 833.12,-51.43 r0 top locked
P4 "61300611121" HDR1X6 1462.87,-51.43 r0 top locked
P5 "61300611121" HDR1X6 2092.62,-51.43 r0 top locked
P6 "61300311121" HDR1X3 3352.12,-51.43 r0 top locked
P7 "TEST POINT 0.5mm Dia" "Test-point - 0.5mm" 4305.75,1108.68 r0 top locked
P8 "61300611121" HDR1X6 2722.37,-51.43 r0 top locked
P9 "TEST POINT 0.5mm Dia" "Test-point - 0.5mm" 4305.75,1021.36 r0 top locked
P10 "TEST POINT 0.5mm Dia" "Test-point - 0.5mm" 4305.75,934.04 r0 top locked
P11 "TEST POINT 0.5mm Dia" "Test-point - 0.5mm" 3376.66,2322.41 r180 top locked
P12 "TEST POINT" Test-point 1497,3393 r0 top locked
P13 "TEST POINT" Test-point 1497,3487.64 r0 top locked
P14 "TEST POINT" Test-point 1497,3579.53 r0 top locked
P15 "TEST POINT" Test-point 1497,3670.26 r0 top locked
P16 "TEST POINT 0.5mm Dia" "Test-point - 0.5mm" 4305.75,846.72 r90 top locked
P19 "61300211121" HDR1X2 3681.12,-51.18 r0 top locked
P27 "61300211121" HDR1X2 245.12,-49.43 r0 top locked
P28 "61300211121" HDR1X2 539.12,-49.43 r0 top locked
Q1 "WNM2016A-3/TR" sot-23 572.69,2432.84 r90 top locked
Q2 "WNM2016A-3/TR" sot-23 569.69,2920.6 r90 top locked
Q3 "WNM2016A-3/TR" sot-23 570.87,3406.03 r90 top locked
Q4 "WNM2016A-3/TR" sot-23 567.87,3895.03 r90 top locked
Q5 "IRF3205STRLPBF" D2Pak. 1036.48,1328.55 r90 top locked
Q6 "IRF3205STRLPBF" D2Pak. 1036.48,1864.57 r90 top locked
Q7 "IRLML6402TRPBF" SOT-23 5031.64,821.77 r180 top locked
Q8 "WNM2016A-3/TR" sot-23 566.87,4382.03 r90 top locked
Q9 "BC847B,215" SOT-23 5818.87,1483.56 r180 top locked
Q10 "BC847B,215" SOT-23 5088.57,1483.56 r180 top locked
Q11 "BC847B,215" SOT-23 5744.87,1621.8 r180 top locked
Q12 "BC847B,215" SOT-23 5017.24,1621.8 r180 top locked
Q13 "BC847B,215" SOT-23 4725.87,1621.8 r180 top locked
Q14 "BC847B,215" SOT-23 5450.61,1621.8 r180 top locked
Q15 "BC847B,215" SOT-23 5450.87,735.03 r180 top locked
Q16 "BC847B,215" SOT-23 4756.87,735.03 r180 top locked
Q17 "BC857C,215" SOT-23 4798.41,1483.56 r180 top locked
Q18 "MMBT5551" SOT-23 5127.87,702.36 r180 top locked
Q19 "MMBT5551" SOT-23 7453.06,3900.65 r270 top
Q20 "RU6085H" RU6085H 1364.62,735.77 r0 top locked
Q21 "IRLML6402TRPBF" SOT-23 5712.87,821.77 r180 top locked
Q22 "MMBT2222A-7-F" SOT-23 2491.84,3101.5 r180 top locked
Q23 "MMBT2222A-7-F" SOT-23 3201.6,3373.26 r0 top locked
Q24 "BC857C,215" SOT-23 5521.87,1483.56 r180 top locked
Q25 "DMN13H750S-7" SOT23-3 3685.1,156.82 r180 top locked
Q26 "Si2302CDS" Sot-23 3955,288.62 r180 top locked
Q29 "BC847B,215" SOT-23 5450.47,1124.66 r180 top locked
Q30 "BC847B,215" SOT-23 4756.87,1128.25 r180 top locked
Q31 "MMBT5551" SOT-23 5811.87,702.36 r180 top locked
Q32 "AO3407" SOT-23 587.77,395.86 r90 top locked
Q33 "MMBT2222A-7-F" SOT-23 772.64,397.63 r180 top locked
Q38 "MMBT5551" SOT-23 7183.87,769.03 r0 top locked
Q39 "2N7002-7-F" SOT23-3 1938.83,570.29 r0 top locked
Q40 "MMBT2222A-7-F" SOT-23 2652.6,3101.5 r180 top locked
Q43 "MMBT2222A-7-F" SOT-23 3482.6,3373.26 r0 top locked
R1 "3.6K" RES-0603 2787.87,1380.03 r180 top locked
R2 "1.2k" RES-0603 2624.98,1315.4 r0 top locked
R3 "0.33R" RES-0603 2624.98,1198.93 r180 top locked value=0.33Ω
R4 "10K" RES-0603 670.87,3399.55 r90 top locked
R5 "4.7K" RES-0603 1808.5,1216.29 r180 top locked
R6 "10K" RES-0603 667.87,3889.55 r90 top locked
R7 "6.8K" RES-0603 1648.28,1241.51 r90 top locked value=6.8kR
R8 "4.7K" RES-0603 1807.5,1685.29 r180 top locked
R9 "10K" RES-0603 666.87,4378.01 r90 top locked
R10 "6.8K" RES-0603 1646.28,1715.51 r90 top locked value=6.8kR
R11 "2.21M" RES-0603 909.82,260.46 r270 top locked
R12 "10K" Res-0402 3994.91,2189 r270 top locked
R13 "2.7K" Res-0402 3955.54,2189 r270 top locked value=2.7kR
R14 "680R" RES-0603 4882.36,2435.03 r0 top locked
R15 "680R" RES-0603 4882.86,2386.27 r0 top locked
R16 "2.2K" Res-0402 4036,3558 r180 top locked
R17 "680R" RES-0603 4882.86,2337.5 r0 top locked
R18 "2.2K" RES-0603 5792.92,4115.3 r0 top locked
R19 "2.2K" RES-0603 6289.27,4115.3 r0 top locked
R20 "10K" RES-0603 7228.64,878.03 r90 top locked
R21 "10K" RES-0603 7269.98,515.4 r90 top locked
R22 "2.2K" RES-0603 7146.14,516.03 r270 top locked
R23 "3.3K" RES-0603 6828.44,2459.75 r180 top locked
R24 "47R" RES-0603 1368.87,1175.03 r270 top locked
R25 "47R" RES-0603 1368.87,1705 r270 top locked
R26 "1K" RES-0603 4960.17,723.62 r180 top locked
R27 "10K" RES-0603 5037.64,920.03 r180 top locked
R28 "4.7K" Res-0603 5191.41,830.31 r270 top locked
R29 "1K" Res-0603 5137.87,831.31 r270 top locked
R30 "20K" RES-0603 1012.14,260.46 r270 top locked
R31 "4.7K" Res-0402 4309.88,2189 r90 top locked
R32 "63.4K" RES-0603 1085.14,260.46 r270 top locked
R33 "4.7K" RES-0603 5875.87,831.31 r270 top locked
R34 "1K" RES-0603 578.87,293.03 r0 top locked
R35 "3.3K" RES-0603 6828.44,1779.92 r180 top locked
R36 "3.3K" RES-0603 7288.23,1859.03 r90 top locked
R37 "2.2K" RES-0603 7197.84,1891.03 r0 top locked
R38 "3.3K" Res-0603 7289.44,2541.49 r90 top locked
R39 "2.2K" RES-0603 7198.05,2572.49 r0 top locked
R40 "1K" RES-0603 5763.87,1381.03 r270 top locked
R41 "1K" RES-0603 5035.03,1381.03 r270 top locked
R42 "4.7K" RES-0603 5920.87,1554.03 r90 top locked
R43 "4.7K" RES-0603 5707.87,1504.03 r270 top locked
R44 "4.7K" RES-0603 5181.87,1554.03 r90 top locked
R45 "4.7K" RES-0603 4979.84,1504.03 r270 top locked
R46 "4.7K" RES-0603 5752.87,1721.03 r180 top locked
R47 "4.7K" RES-0603 5023.87,1721.03 r180 top locked
R48 "4.7K" RES-0603 4629.87,1564.03 r90 top locked
R49 "4.7K" RES-0603 5351.87,1564.32 r90 top locked
R50 "1K" RES-0603 5311.87,570.92 r270 top locked
R51 "1K" RES-0603 4621.23,569.92 r270 top locked
R52 "4.7K" RES-0603 4732.87,1717.03 r180 top locked
R53 "4.7K" Res-0603 7525.38,4542.53 r90 top locked
R54 "13.7K" RES-0603 5800.51,2947.38 r90 top value=13.7kR
R55 "DNP" Res-0402 6705.5,2960 r0 top
R56 "4.7K" RES-0603 5458.87,1717.03 r180 top locked
R57 "4.7K" Res-0402 5275.87,3732.03 r0 top locked
R58 "4.7K" Res-0402 5275.87,3785.51 r0 top locked
R59 "4.7K" Res-0402 5275.87,3835.51 r0 top locked
R60 "4.7K" Res-0402 5275.87,3885.51 r0 top locked
R61 "4.7K" Res-0402 4882.53,3768.03 r270 top locked
R62 "4.7K" RES-0603 7324.67,3938.05 r180 top
R63 "22R" Res-0402 4867.17,3947.53 r90 top locked
R64 "100K" RES-0805 1283.98,429.4 r0 top locked
R65 "1K" Res-1206 1577.98,415.4 r90 top locked
R66 "10K" RES-0603 7197.99,516.03 r270 top locked
R67 "1K" RES-0603 5642.87,723.62 r180 top locked
R68 "10K" RES-0603 5719.87,920.03 r180 top locked
R69 "10K" RES-0603 672.69,2426.36 r90 top locked
R70 "10K" RES-0603 670.69,2914.12 r90 top locked
R71 "1K" RES-0603 679.14,388.46 r270 top locked
R72 "10K" RES-0603 3722.51,278.28 r90 top locked
R73 "10K" Res-0402 3955,371.33 r180 top locked
R74 "10K" Res-0402 3973.5,199 r180 top locked
R75 "1K" RES-0603 3872,169 r270 top locked
R76 "3.3K" RES-0603 6828.44,1097.92 r180 top locked
R77 "3.3K" RES-0603 7288.23,1178.82 r90 top locked
R78 "2.2K" RES-0603 7197.84,1208.82 r0 top locked
R79 "3.3K" RES-0603 6829.23,2990.92 r180 top locked
R80 "2.2K" RES-0603 7263.23,2990.92 r0 top locked
R81 "470R" RES-0603 811.04,533.96 r270 top locked
R82 "10K" RES-0603 1087.14,533.96 r90 top locked
R83 "200K" RES-0603 1280.8,2257.89 r90 top locked
R84 "200K" RES-0603 1252.87,2393.03 r0 top locked
R85 "1K" RES-0603 1280.8,2176.21 r0 top locked
R86 "4.7K" RES-0603 4744.87,1381.03 r90 top locked
R87 "22R" Res-0402 4925.54,3947.53 r90 top locked
R88 "4.7K" RES-0603 5465.87,1381.03 r90 top locked
R89 "100K" RES-0603 5497.87,614.03 r90 top locked
R90 "100K" RES-0603 4810.87,614.03 r90 top locked
R91 "1M" RES-0603 4688.47,1381.03 r90 top locked
R92 "1M" RES-0603 5408.87,1381.03 r90 top locked
R93 "330R" RES-0603 5311.87,961.03 r270 top locked
R94 "330R" RES-0603 4621.79,965.03 r270 top locked
R95 "50K" "RES 0805" 4835.87,1621.8 r90 top locked
R96 "50K" "RES 0805" 5560.87,1621.8 r90 top locked
R97 "150K" RES-0603 4850.81,1381.03 r270 top locked
R98 "150K" RES-0603 5573.87,1381.03 r270 top locked
R99 "100K" RES-0603 5487.87,1008.03 r90 top locked
R100 "100K" RES-0603 4796.87,1008.03 r90 top locked
R101 "10K" RES-0603 4688.47,1504.03 r90 top locked
R102 "10K" RES-0603 5408.87,1504.03 r90 top locked
R103 "150R" RES-0603 6275.03,645.4 r270 top locked
R104 "DNP" Res-0402 6705.5,2910 r0 top
R105 "DNP" Res-0402 6327.95,3141.6 r270 top
R106 "4.7K" Res-0402 4910.03,3835.51 r0 top locked
R107 "1K" Res-0603 5821.87,831.31 r270 top locked
R108 "120R" Res-0603 4896.03,3885.51 r0 top locked
R109 "1.82M" Res-0603 2357.41,2178 r270 top locked value=1.82MR
R110 "10K" Res-0603 6220.69,644.4 r270 top locked
R111 "2.2K" Res-0603 6166.74,644.4 r270 top locked
R112 "7.5K" Res-0603 6435.87,646.4 r270 top locked
R113 "3.3K" Res-0603 6542.87,646.4 r270 top locked
R114 "10K" Res-0603 6489.53,646.4 r270 top locked
R115 "2.2K" Res-0603 6489.53,759.03 r270 top locked
R116 "20K" Res-0603 6934.84,4586.41 r225 top locked
R117 "0R" Res-0603 909.82,533.96 r270 top locked
R118 "0R" Res-0603 1012.18,533.96 r270 top locked
R119 "10R" RES-0805 2067.75,780.67 r270 top locked
R120 "4mR" "RES 2512" 2858.75,734.67 r180 top locked
R121 "2.2R" Res-0402 2432.75,790.67 r270 top locked
R122 "5.23K" RES-0603 2186.75,519.67 r270 top locked
R123 "499K" Res-0402 2028.87,672.03 r90 top locked
R124 "30.1K" RES-0603 2127.75,519.67 r270 top locked
R125 "36K" Res-0402 2028.87,589.79 r90 top locked value=36kR
R126 "10K" Res-0603 1883.87,192.03 r0 top locked
R127 "499K" Res-0603 2340.75,536.67 r270 top locked
R128 "10K" Res-0603 1883.87,255.03 r0 top locked
R129 "86.6K" Res-0402 2283.66,536.67 r90 top locked value=86.6kR
R130 "100K" Res-0201 3976.23,980.16 r0 top locked
R131 "470R" Res-0603 4235.87,846.8 r90 top locked
R132 "470R" Res-0201 3592.7,506.31 r0 top locked
R133 "47K" Res-0402 3980.23,1020.16 r180 top locked
R134 "10K" Res-0402 3615.36,2856.36 r0 top locked
R135 "1K" Res-0201 2964.87,3454.33 r0 top locked
R136 "1.82M" Res-0603 2218.33,2126.72 r180 top locked value=1.82MR
R137 "220R" Res-0603 2617.99,3008 r180 top
R138 "4.7K" Res-0402 2693,3218.5 r270 top locked
R139 "47K" Res-0402 2636.49,3197.14 r0 top locked
R140 "1K" Res-0201 2964.87,3414.96 r0 top locked
R141 "4.7K" Res-0402 2533,3218.5 r270 top locked
R142 "47K" Res-0402 2474.34,3197 r0 top locked
R143 "10R" Res-0402 2609,4559.04 r90 top locked
R144 "47K" Res-0402 1356.87,3916.53 r90 top locked
R145 "220R" Res-0603 2617.99,2951.5 r180 top
R146 "4.7K" Res-0402 3445.65,3267.03 r270 top locked
R147 "47K" Res-0402 3498.74,3285.53 r180 top locked
R148 "0R" RES-2512 2227.87,225.03 r0 top locked
R149 "0R" RES-2512 827.87,776.03 r180 top locked
R150 "22R" Res-0201 1324.86,4004.03 r0 top locked
R151 "22R" Res-0201 1324.86,4083.41 r0 top locked
R152 "22R" Res-0201 1324.86,3970.03 r0 top locked
R153 "22R" Res-0201 1324.86,4117.12 r0 top locked
R154 "4.7K" Res-0402 3164.2,3267.03 r90 top locked
R155 "47K" Res-0402 3217.6,3285.53 r180 top locked
R156 "10K" Res-0201 4248.31,4054.7 r270 top locked
R157 "10K" Res-0201 4117,3981 r270 top locked
R158 "10K" Res-0201 4018.54,4054.48 r270 top locked
R159 "10K" Res-0201 3936.92,4054.7 r270 top locked
R160 "10K" Res-0201 3816,4484 r270 top locked
R161 "1M" Res-0603 2355.49,2460 r90 top locked
R162 "1M" Res-0603 2329.33,2536 r0 top locked
R163 "20K" Res-0603 2304.34,2460 r90 top locked
R164 "402K" Res-0603 2294.88,2177.99 r90 top locked
R165 "845K" Res-0603 2405.49,2177.99 r90 top locked
R166 "499K" Res-0603 2218.33,2075.45 r0 top locked
R167 "33K" Res-0603 2453.57,2178 r90 top locked value=33kR
R168 "10K" Res-0603 2074.87,519.67 r90 top locked
R169 "DNP" Res-0402 6327.95,3027.69 r90 top
R170 "10K" Res-0402 6031.6,2978.04 r180 top
SB2 "Solder Bridge" "Solder Bridge" 4932.67,815.31 r270 top locked
SB3 "Solder Bridge" "Solder Bridge" 7443.87,4626.46 r180 top locked
SB5 "Solder Bridge" "Solder Bridge" 6600.87,567.03 r270 top locked
SB7 "Solder Bridge" "Solder Bridge" 1426.98,433.4 r180 top locked
SB8 "Solder Bridge" "Solder Bridge" 5613.87,815.31 r270 top locked
SB9 "Solder Bridge" "Solder Bridge" 678.87,523.03 r270 top locked
SB35 "Solder Bridge" "Solder Bridge" 6328.65,646.4 r270 top locked
SB36 "Solder Bridge" "Solder Bridge" 6382.98,646.4 r270 top locked
SB37 "Solder Bridge" "Solder Bridge" 6166.74,761.03 r90 top locked
SB38 "Solder Bridge" "Solder Bridge" 6600.87,815.03 r90 top locked
SB39 "Solder Bridge" "Solder Bridge" 619.87,523.03 r90 top locked
SB40 "Solder Bridge" "Solder Bridge" 1624.87,774.03 r0 top locked
SB43 "Solder Bridge" "Solder Bridge" 7496.98,567.4 r270 top locked
SB44 "Solder Bridge" "Solder Bridge" 7439.98,567.4 r270 top locked
SW1 "Tactile Switch" TL3300CF160Q 5595.42,4393.55 r90 top locked
SW2 "Tactile Switch" TL3300CF160Q 6091.2,4393.55 r90 top locked
SW3 "" TL3300CF160Q 6586.98,4393.55 r90 top locked
SW4 "" SS-12D02-G040 4018.13,3675.03 r0 top locked
U1 "ACS723LLCTR-20AU-T" SOIC-8 2034.5,1240.29 r180 top locked
U2 "ACS723LLCTR-20AU-T" SOIC-8 2034.5,1710.29 r180 top locked
U3 "MC34063ADR" SOIC-8 2848.99,1229.3 r180 top locked
U4 "LMS8117AMP-3.3/NOPB" SOT-223 3971.28,1831.57 r0 top locked
U5 "MAX38889AATE+" "16-QFN (3x3)." 2365.33,2320.53 r270 top locked
U6 "NCP81071ADR2G" SOIC-8 1083.69,2252.21 r180 top locked
U7 "LTC4359CMS8#PBF" LTC4359CMS8#PBF 1371.85,547.5 r0 top locked
U8 "PS2801C-1-F3-A" PS2801C-1-F3-A 7048.23,1122.92 r180 top locked
U9 "PS2801C-1-F3-A" PS2801C-1-F3-A 7047.23,3015.92 r180 top locked
U10 "SN74LV1T34DBVR" SOT-23-5 1441.28,2189.85 r180 top locked
U11 "SN74LV1T34DBVR" SOT-23-5 1441.69,2406.21 r180 top locked
U12 "SN74LV1T34DBVR" SOT-23-5 1441.28,2541.06 r180 top locked
U13 "TPS3700DDCR" SOT-23-6 961,397.63 r0 top locked
U14 "PS2801C-1-F3-A" PS2801C-1-F3-A 7048.23,1803.92 r180 top locked
U15 "PS2801C-1-F3-A" PS2801C-1-F3-A 7046.44,2484.75 r180 top locked
U16 "SN74LV4052ADR" SOIC-16 6515,2985 r0 top
U17 "AS312" AS312 7076.91,4488.04 r225 top locked
U18 "AP4008QD" PDFN3x3 2553.95,765.62 r270 top locked
U19 "BQ24650RVAR" QFN-16-EP(3.6x3.6) 2246.64,682.83 r0 top locked
U20 "MIC29302WU-TR" "TO-263-5 (D2PAK)" 3675.57,817.03 r90 top locked
U21 "STM32F103ZGT6" LQFP-144(20x20) 4122.87,2696.03 r0 top locked
U22 "SMF05CT1G-ES" SOT-363 1230.87,4075.03 r270 top locked
U23 "TXB0102DCUT" TXB0102DCUT 3400.28,3890.21 r0 top locked
U24 "SP3485EIM/TR" SOP-8 5092.89,3810.51 r180 top locked
U25 "A7672E (FASE)" "A7672E (FASE)" 2416.26,3848.03 r270 top locked
U26 "TXB0102DCUT" TXB0102DCUT 3399.87,3756.03 r0 top locked
U27 "LMS8117AMP-3.3/NOPB" "SOT- 223" 3363.69,2107.5 r180 top locked
U28 "HC-12 SMD" "HC-12 Module SMD" 6760,3506.23 r0 top
U29 "SY6280AAC" SOT-23-5 5912.76,3015.45 r0 top
U30 "AP63205WU-7" TSOT-23-6 4090.51,467.33 r0 top locked
X1 "8MHz" XC32M4-8.000-F18LJDT 3502.16,2607.31 r270 top locked
X3 "32.768kHz" X321532768KGD2SI 3524,2892.1 r270 top locked

## Footprints (in the part's own frame and the unit in brackets; to place one, negate y for a bottom-side part, rotate by r counter-clockwise, add the part's x,y. Pads: shape width x height; smd on the part's side, far side on the other; paste and mask are expansions set on the pad)
"16-QFN (3x3)." [mm]
  rect 0.7x0.25 smd: 1(-1.45,0.75) 2(-1.45,0.25) 3(-1.45,-0.25) 4(-1.45,-0.75) 9(1.45,-0.75) 10(1.45,-0.25) 11(1.45,0.25) 12(1.45,0.75)
  rect 0.25x0.7 smd: 5(-0.75,-1.45) 6(-0.25,-1.45) 7(0.25,-1.45) 8(0.75,-1.45) 13(0.75,1.45) 14(0.25,1.45) 15(-0.25,1.45) 16(-0.75,1.45)
  rect 1.7x1.7 smd: 17(0,0)
  silkscreen extent -2.08,-1.6 1.6,1.6, body extent -1.55,-1.55 1.55,1.55, height 0.99
10118194-0001LF_ [mm]
  rect 0.42x1.35 smd: 1(-1.3,0) 2(-0.65,0) 3(0,0) 4(0.65,0) 5(1.3,0)
  oval 1.25x1 hole 0.55 slot 0.85 at 0 deg: MH1(-2.5,0) MH2(2.5,0)
  oval 0.8x1.55 hole 0.5 slot 1.15 at 90 deg: MH3(-3.5,-2.7) MH4(3.5,-2.7)
  rect 1.5x1.55 smd: MP1(-1,-2.7) MP2(1,-2.7)
  Top Layer region: 193 vertices and 0 holes, not listed, extent -4,-3.475 -2.3,-1.92
  Top Layer region: 193 vertices and 0 holes, not listed, extent 2.3,-3.48 4,-1.925
  silkscreen extent -3.73,-5 3.72,0.71, body extent -4.02,-5.34 4.03,0.19, height 2.69
20021121-00010C4LF_ [mm]
  rect 0.76x2.4 smd: 1(-2.54,-1.95) 2(-2.54,1.95) 3(-1.27,-1.95) 4(-1.27,1.95) 5(0,-1.95) 6(0,1.95) 7(1.27,-1.95) 8(1.27,1.95) 9(2.54,-1.95) 10(2.54,1.95)
  silkscreen extent -3.43,-2.08 3.23,1.22, body extent -3.17,-2.78 3.18,2.72, height 4.5
A2008WR-S-8P [mm]
  rect 1x3.4 smd: 1(-7.5,3.75) 2(-5.5,3.75) 3(-3.5,3.75) 4(-1.5,3.75) 5(0.5,3.75) 6(2.5,3.75) 7(4.5,3.75) 8(6.5,3.75)
  rect 1.5x3.6 smd: MP1(-9.8,-3.75) MP2(8.8,-3.75)
  silkscreen extent -10.54,-5.82 9.54,3.84, body extent -10.51,-5.77 9.49,4.23, height 5.2
"A7672E (FASE)" [mm]
  rect 2x0.6 smd: 1(-12,8) 2(-12,7) 3(-12,6) 4(-12,5) 5(-12,4) 6(-12,3) 7(-12,2) 8(-12,1) 9(-12,0) 10(-12,-1) 11(-12,-2) 12(-12,-3) 13(-12,-4) 14(-12,-5) 15(-12,-6) 16(-12,-7) 17(-12,-8) 35(12,-8) 36(12,-7) 37(12,-6) 38(12,-5) 39(12,-4) 40(12,-3) 41(12,-2) 42(12,-1) 43(12,0) 44(12,1) 45(12,2) 46(12,3) 47(12,4) 48(12,5) 49(12,6) 50(12,7) 51(12,8)
  rect 0.6x2 smd: 18(-8,-12) 19(-7,-12) 20(-6,-12) 21(-5,-12) 22(-4,-12) 23(-3,-12) 24(-2,-12) 25(-1,-12) 26(0,-12) 27(1,-12) 28(2,-12) 29(3,-12) 30(4,-12) 31(5,-12) 32(6,-12) 33(7,-12) 34(8,-12) 52(8,12) 53(7,12) 54(6,12) 55(5,12) 56(4,12) 57(3,12) 58(2,12) 59(1,12) 60(0,12) 61(-1,12) 62(-2,12) 63(-3,12) 64(-4,12) 65(-5,12) 66(-6,12) 67(-7,12) 68(-8,12) 89(-11,-12) 90(-10,-12) 91(-9,-12) 92(9,-12) 93(10,-12) 94(11,-12) 95(11,12) 96(10,12) 97(9,12) 98(-9,12) 99(-10,12) 100(-11,12)
  rect 2.1x2.1 smd: 69(-7.6,7.6) 70(-7.6,3.8) 71(-7.6,0) 72(-7.6,-3.8) 73(-7.6,-7.6) 74(-3.8,-7.6) 75(0,-7.6) 76(3.8,-7.6) 77(7.6,-7.6) 78(7.6,-3.8) 79(7.6,0) 80(7.6,3.8) 81(7.6,7.6) 82(3.8,7.6) 83(0,7.6) 84(-3.8,7.6) 85(-3.8,0) 86(0,-3.8) 87(3.8,0) 88(0,3.8)
  rect 1.1x0.9 smd: 101(-9.8,3.5) 102(-9.8,2.1) 103(-9.8,0.7) 104(-9.8,-0.7) 105(-9.8,-2.1) 106(-9.8,-3.5) 113(9.8,-3.5) 114(9.8,-2.1) 115(9.8,-0.7) 116(9.8,0.7) 117(9.8,2.1) 118(9.8,3.5)
  rect 0.9x1.1 smd: 107(-3.5,-9.8) 108(-2.1,-9.8) 109(-0.7,-9.8) 110(0.7,-9.8) 111(2.1,-9.8) 112(3.5,-9.8) 119(3.5,9.8) 120(2.1,9.8) 121(0.7,9.8) 122(-0.7,9.8) 123(-2.1,9.8) 124(-3.5,9.8)
  Keep-Out Layer region: -10.7,6.795 -9,6.795 -9,9.195 -10.7,9.195
  Keep-Out Layer region: 1.473,-4.133 3.523,-4.133 3.523,-2.083 1.473,-2.083
  silkscreen extent -13.31,-12.06 12.04,12.07, body extent -12,-12 12,12, height 2.5
ALS-PT19-315C/L177/TR [mm]
  rect 0.82x0.82 smd: 1(-0.75,0) 2(0.75,0)
  silkscreen extent -1.7,-0.53 1.27,0.53, body extent -0.85,-0.4 0.85,0.4, height 0.6
ANT3216LL00R2400A [mm]
  rect 0.8x1.8 smd: 1(0,0) 2(3.1,0)
  Top Layer region: -0.178,0.897 -2.2,0.897 -2.2,-0.903 -0.178,-0.903
  Top Layer region: 3.277,-0.9 5.8,-0.9 5.8,0.9 3.277,0.9
  Keep-Out Layer region: 6.119,-1.067 7.769,-1.067 7.769,1.041 6.119,1.041
  Keep-Out Layer region: -2.137,1.27 7.769,1.27 7.769,4.953 -2.137,4.953
  Keep-Out Layer region: -2.137,-4.953 7.769,-4.953 7.769,-1.27 -2.137,-1.27
  silkscreen extent -2.2,-5 7.8,5, body extent -0.08,-0.8 3.12,0.8, height 1
AS312 [mm]
  round 1.8 hole 0.9: 1(-2.54,1.27) 2(0,-1.27) 3(2.54,1.27)
  silkscreen extent -4.55,-3.28 4.55,5.82, body extent -4.58,-3.25 4.52,5.85, height 4.25
Cap0402 [mil]
  rect 18x25 smd mask+2.36: 1(-18.5,0) 2(18.5,0)
  silkscreen extent -31,-16 31,16, body extent -20,-10 20,10, height 19
Cap0603 [mil]
  rect 30x35 smd mask+2.36: 1(-30,0) 2(30,0)
  silkscreen extent -49,-21 49,21, body extent -32,-16 31,16, height 34
CAP-0201 [mm]
  rect 0.3x0.3 smd mask+0.055: 1(-0.3,0) 2(0.3,0)
  silkscreen extent -0.53,-0.23 0.53,0.23, body extent -0.3,-0.15 0.3,0.15, height 0.28
Cap-0402 [mil]
  rect 18x25 smd mask+2.36: 1(-18.5,0) 2(18.5,0)
  silkscreen extent -31,-16 31,16, body extent -20,-10 20,10, height 19
Cap-0603 [mil]
  rect 30x35 smd mask+2.36: 1(-30,0) 2(30,0)
  silkscreen extent -49,-21 49,21, body extent -32,-16 31,16, height 34
Cap-0805 [mil] "SMD 0805"
  rect 40x60 smd mask+2.76: 1(-40,0) 2(40,0)
  silkscreen extent -64,-34 64,34, body extent -39,-25 39,25, height 30
Cap-1206 [mil] "SMD 1206"
  rect 60x70 smd: 1(-50,0) 2(50,0)
  silkscreen extent -84,-39 84,39, body extent -63,-31 63,32, height 39
Case-B [mm]
  rect 1.7x3 smd paste+0: 1(-1.7,0) 2(1.7,0)
  silkscreen extent -3.35,-1.63 2.03,1.63, body extent -1.85,-1.5 1.85,1.5, height 2.16
Case-E [mm]
  rect 2.79x2.57 smd: 1(0,0) 2(6.44,0)
  silkscreen extent -1.56,-2.31 7.03,2.31, body extent -0.27,-2.21 6.92,2.21, height 2.88
D2Pak. [mm]
  rect 2.08x3.81 smd: 1(-2.54,-5.335) 2(2.54,-5.335)
  rect 11.43x8.89 smd: 3(0,5.335)
  silkscreen extent -5.21,-5.46 5.11,0.51, body extent -5.08,-6.6 5.02,8.79, height 4.5
DB125-2.54-3P-GN-S [mm]
  rect 2x2 hole 1.4: 1(-2.54,0)
  round 2 hole 1.4: 2(0,0) 3(2.54,0)
  silkscreen extent -4.06,-3.4 4.06,3.1, body extent -4.06,-3.41 4.06,3.09, height 8.5
DFN1006-2L_ [mm]
  rect 0.55x0.66 smd: 1(-0.425,0) 2(0.425,0)
  silkscreen extent -1.14,-0.51 0.81,0.51, body extent -0.5,-0.3 0.5,0.3, height 0.47
DM3BT-DSF-PEJS [mm]
  rect 0.7x1.4 smd: 1(-2.85,7.45) 2(-1.75,7.45) 3(-0.65,7.45) 4(0.45,7.45) 5(1.55,7.45) 6(2.65,7.45) 7(3.75,7.45) 8(4.85,7.45)
  rect 1x1.4 smd: S1(-4.75,7.45)
  rect 1.2x1.2 smd: S2(6.65,3.25)
  rect 1.2x3.2 smd: S3(6.65,-6.55)
  rect 1.5x1.9 smd paste-2 mask+0: S4(-6.65,-7.55)
  rect 1.2x0.8 smd: SW-A(6.65,-2.95)
  rect 0.7x1.2 smd: SW-B(5.8,7.55)
  Top Layer region: -5.9,-7.85 -5.75,-8 -5.4,-8 -5.4,-8.5 -7.4,-8.5 -7.4,-6.6 -5.9,-6.6
  Keep-Out Layer region: 7.15,-0.95 6.4,-0.95 6.4,2.65 7.15,2.65
  Keep-Out Layer region: 7.15,3.85 6.4,3.85 6.4,7.1 7.15,7.1
  silkscreen extent -7,-8.58 6.85,8.46, body extent -6.96,-9.93 6.89,7.62, height 1.8
DSN0603-2 [mm]
  rect 0.2x0.24 smd mask+0.055: 1(-0.2,0) 2(0.2,0)
  silkscreen extent -0.38,-0.2 0.38,0.2, body extent -0.3,-0.15 0.3,0.15, height 0.32
Fuse-0603 [mm]
  rect 1x1 smd: 1(-0.85,0) 2(0.85,0)
  silkscreen extent -0.25,-0.48 0.25,0.48, body extent -0.77,-0.42 0.78,0.43, height 0.45
Fuse-0805 [mm]
  rect 1x1.7 smd: 1(-1.1,0) 2(1.1,0)
  silkscreen extent -0.41,-0.81 0.41,0.81, body extent -1.1,-0.75 1.1,0.75, height 1.24
"HC-12 Module SMD" [mm]
  rect 3x1.8 smd: 1(-12.873,6.006) 2(-12.873,3.466) 3(-12.873,0.926) 4(-12.873,-1.614) 5(-12.873,-4.154) 6(13.127,2.586) 7(13.127,5.126) 8(13.127,0.046)
  silkscreen extent -14.17,-6.27 13.63,8.13, body extent -13.98,-5.72 13.42,7.48, height 2.15
HDR1X2 [mm] "CONN HEADER VERT 2POS 2.54MM"
  rect 1.8x1.8 hole 0.9: 1(0,0)
  round 1.8 hole 0.9: 2(2.54,0)
  silkscreen extent -1.27,-1.27 3.81,1.27, body extent -1.27,-1.27 3.81,1.27, height 8.44
HDR1X3 [mm] "Connector; Header; 3 Position"
  rect 1.8x1.8 hole 0.9: 1(0,0)
  round 1.8 hole 0.9: 2(2.54,0) 3(5.08,0)
  silkscreen extent -1.27,-1.27 6.35,1.27, body extent -1.27,-1.24 6.35,1.25, height 8.54
HDR1X4_ [mm] "Connector; Header; 4 Position"
  rect 1.6x1.6 hole 0.95: 1(0,0)
  round 1.6 hole 0.95: 2(2.54,0) 3(5.08,0) 4(7.62,0)
  silkscreen extent -1.27,-1.27 8.89,1.27, body extent -1.27,-1.27 8.89,1.27, height 9.5
HDR1X6 [mm] "Connector; Header; 6 Position"
  rect 1.8x1.8 hole 0.9: 1(0,0)
  round 1.8 hole 0.9: 2(2.54,0) 3(5.08,0) 4(7.62,0) 5(10.16,0) 6(12.7,0)
  silkscreen extent -1.27,-1.27 13.97,1.27, body extent -1.27,-1.24 13.97,1.25, height 8.54
HDR1X7 [mm] "Connector; Header; 7 Position"
  rect 1.6x1.6 hole 0.9: 1(0,0)
  round 1.6 hole 0.9: 2(2.54,0) 3(5.08,0) 4(7.62,0) 5(10.16,0) 6(12.7,0) 7(15.24,0)
  silkscreen extent -1.27,-1.27 16.51,1.27, body extent -1.27,-1.24 16.51,1.25, height 8.74
HJ-SMA508_ [mm]
  round 2.5 hole 1.4: 1(0,0)
  round 2.5 hole 1.5: 2(-2.54,2.54) 3(-2.54,-2.54) 4(2.54,-2.54) 5(2.54,2.54)
  silkscreen extent -3.05,-3.05 3.05,3.05, body extent -3,-2.95 3,11.05, height 9.6
"IND-0603 (1608 Metric)" [mm] "0.063\" L x 0.032\" W (1.60mm x 0.80mm)"
  rect 0.6x0.8 smd: 1(-0.7,0) 2(0.7,0)
  silkscreen extent -0.2,-0.46 0.23,0.46, body extent -0.8,-0.4 0.8,0.4, height 0.78
Ind-0805 [mm] "Inductor 0805"
  rect 1.2x1.32 smd: 1(-1,0) 2(1,0)
  silkscreen extent -0.25,-0.69 0.25,0.69, body extent -1,-0.62 1,0.63, height 0.47
"Inductor 1008" [mm]
  rect 0.85x2 smd: 1(-0.825,0) 2(0.825,0)
  silkscreen extent -0.23,-1.07 0.23,1.07, body extent -1.25,-1.07 1.25,1.03, height 1.31
"LED 0402" [mm]
  rect 0.62x0.72 smd: 1(-0.475,0) 2(0.475,0)
  silkscreen extent -0.91,-0.56 1.6,0.56, body extent -0.5,-0.25 0.51,0.25, height 0.45
LED-0402 [mm]
  rect 0.62x0.72 smd: 1(-0.475,0) 2(0.475,0)
  silkscreen extent -0.89,-0.51 1.55,0.51, body extent -0.5,-0.25 0.51,0.25, height 0.45
LED-0603 [mm]
  rect 0.5x1 smd: 1(-0.75,0) 2(0.75,0)
  silkscreen extent -1.12,-0.66 1.75,0.66, body extent -0.82,-0.37 0.82,0.36, height 0.68
LQFP-144(20x20) [mm]
  rect 1.56x0.28 smd: 1(-10.68,8.75) 2(-10.68,8.25) 3(-10.68,7.75) 4(-10.68,7.25) 5(-10.68,6.75) 6(-10.68,6.25) 7(-10.68,5.75) 8(-10.68,5.25) 9(-10.68,4.75) 10(-10.68,4.25) 11(-10.68,3.75) 12(-10.68,3.25) 13(-10.68,2.75) 14(-10.68,2.25) 15(-10.68,1.75) 16(-10.68,1.25) 17(-10.68,0.75) 18(-10.68,0.25) 19(-10.68,-0.25) 20(-10.68,-0.75) 21(-10.68,-1.25) 22(-10.68,-1.75) 23(-10.68,-2.25) 24(-10.68,-2.75) 25(-10.68,-3.25) 26(-10.68,-3.75) 27(-10.68,-4.25) 28(-10.68,-4.75) 29(-10.68,-5.25) 30(-10.68,-5.75) 31(-10.68,-6.25) 32(-10.68,-6.75) 33(-10.68,-7.25) 34(-10.68,-7.75) 35(-10.68,-8.25) 36(-10.68,-8.75) 73(10.68,-8.75) 74(10.68,-8.25) 75(10.68,-7.75) 76(10.68,-7.25) 77(10.68,-6.75) 78(10.68,-6.25) 79(10.68,-5.75) 80(10.68,-5.25) 81(10.68,-4.75) 82(10.68,-4.25) 83(10.68,-3.75) 84(10.68,-3.25) 85(10.68,-2.75) 86(10.68,-2.25) 87(10.68,-1.75) 88(10.68,-1.25) 89(10.68,-0.75) 90(10.68,-0.25) 91(10.68,0.25) 92(10.68,0.75) 93(10.68,1.25) 94(10.68,1.75) 95(10.68,2.25) 96(10.68,2.75) 97(10.68,3.25) 98(10.68,3.75) 99(10.68,4.25) 100(10.68,4.75) 101(10.68,5.25) 102(10.68,5.75) 103(10.68,6.25) 104(10.68,6.75) 105(10.68,7.25) 106(10.68,7.75) 107(10.68,8.25) 108(10.68,8.75)
  rect 0.28x1.56 smd: 37(-8.75,-10.68) 38(-8.25,-10.68) 39(-7.75,-10.68) 40(-7.25,-10.68) 41(-6.75,-10.68) 42(-6.25,-10.68) 43(-5.75,-10.68) 44(-5.25,-10.68) 45(-4.75,-10.68) 46(-4.25,-10.68) 47(-3.75,-10.68) 48(-3.25,-10.68) 49(-2.75,-10.68) 50(-2.25,-10.68) 51(-1.75,-10.68) 52(-1.25,-10.68) 53(-0.75,-10.68) 54(-0.25,-10.68) 55(0.25,-10.68) 56(0.75,-10.68) 57(1.25,-10.68) 58(1.75,-10.68) 59(2.25,-10.68) 60(2.75,-10.68) 61(3.25,-10.68) 62(3.75,-10.68) 63(4.25,-10.68) 64(4.75,-10.68) 65(5.25,-10.68) 66(5.75,-10.68) 67(6.25,-10.68) 68(6.75,-10.68) 69(7.25,-10.68) 70(7.75,-10.68) 71(8.25,-10.68) 72(8.75,-10.68) 109(8.75,10.68) 110(8.25,10.68) 111(7.75,10.68) 112(7.25,10.68) 113(6.75,10.68) 114(6.25,10.68) 115(5.75,10.68) 116(5.25,10.68) 117(4.75,10.68) 118(4.25,10.68) 119(3.75,10.68) 120(3.25,10.68) 121(2.75,10.68) 122(2.25,10.68) 123(1.75,10.68) 124(1.25,10.68) 125(0.75,10.68) 126(0.25,10.68) 127(-0.25,10.68) 128(-0.75,10.68) 129(-1.25,10.68) 130(-1.75,10.68) 131(-2.25,10.68) 132(-2.75,10.68) 133(-3.25,10.68) 134(-3.75,10.68) 135(-4.25,10.68) 136(-4.75,10.68) 137(-5.25,10.68) 138(-5.75,10.68) 139(-6.25,10.68) 140(-6.75,10.68) 141(-7.25,10.68) 142(-7.75,10.68) 143(-8.25,10.68) 144(-8.75,10.68)
  silkscreen extent -11.81,-10.03 10.03,10.03, body extent -11,-11 11,11, height 1.61
LTC4359CMS8#PBF [mm]
  rect 0.889x0.42 smd: 1(-2.105,0.975) 2(-2.105,0.325) 3(-2.105,-0.325) 4(-2.105,-0.975) 5(2.105,-0.975) 6(2.105,-0.325) 7(2.105,0.325) 8(2.105,0.975)
  silkscreen extent -2.51,-1.57 1.42,1.57, body extent -2.46,-1.53 2.46,1.52, height 1.01
"Net Tie Pad" [mil]
  rect 18x25 smd mask-10: 1(-18.5,0) 2(18.5,0)
  Top Layer region: -14.98,-5 15.02,-5 15.02,5 -14.98,5
PDFN3x3 [mm]
  rect 0.6x0.4 smd: 1(-1.5,0.975) 2(-1.5,0.325) 3(-1.5,-0.325) 4(-1.5,-0.975) 5(1.5,-0.325) 5(1.5,-0.975) 6(1.5,0.975) 6(1.5,0.325)
  rect 2.35x1.27 smd: 5(0.356,-0.762)
  rect 2.35x1.29 smd: 6(0.356,0.762)
  silkscreen extent -1.99,-1.68 1.55,1.68, body extent -1.68,-1.64 1.68,1.64, height 0.77
"Pogo 4 Pin" [mm]
  round 1.6 smd: 1(-3.75,0) 2(-1.25,0) 3(1.25,0) 4(3.75,0)
  silkscreen extent -5.11,-1.09 4.83,1.09
"PowerDI™ 5" [mm]
  rect 1.39x1.4 smd: 1(-0.92,-1.991) 2(0.92,-1.991)
  rect 3.36x4.86 smd: 3(0,1.991)
  silkscreen extent -2.16,-2.24 2.03,3.51, body extent -1.98,-2.39 1.98,4.12, height 1.15